# Altium PCB PCB_GTV3.3.PcbDoc (part 1 of 11)
Units mil, origin at the board's own origin, x right, y up, seen from the top; angles counter-clockwise.
Board outline 8070.87 x 4881.89 mil, 4 copper layers (Top Layer, GND, PWR, Bottom Layer), stack 61.653 mil thick; 464 components, 293 nets, 1458 pads, 748 vias.
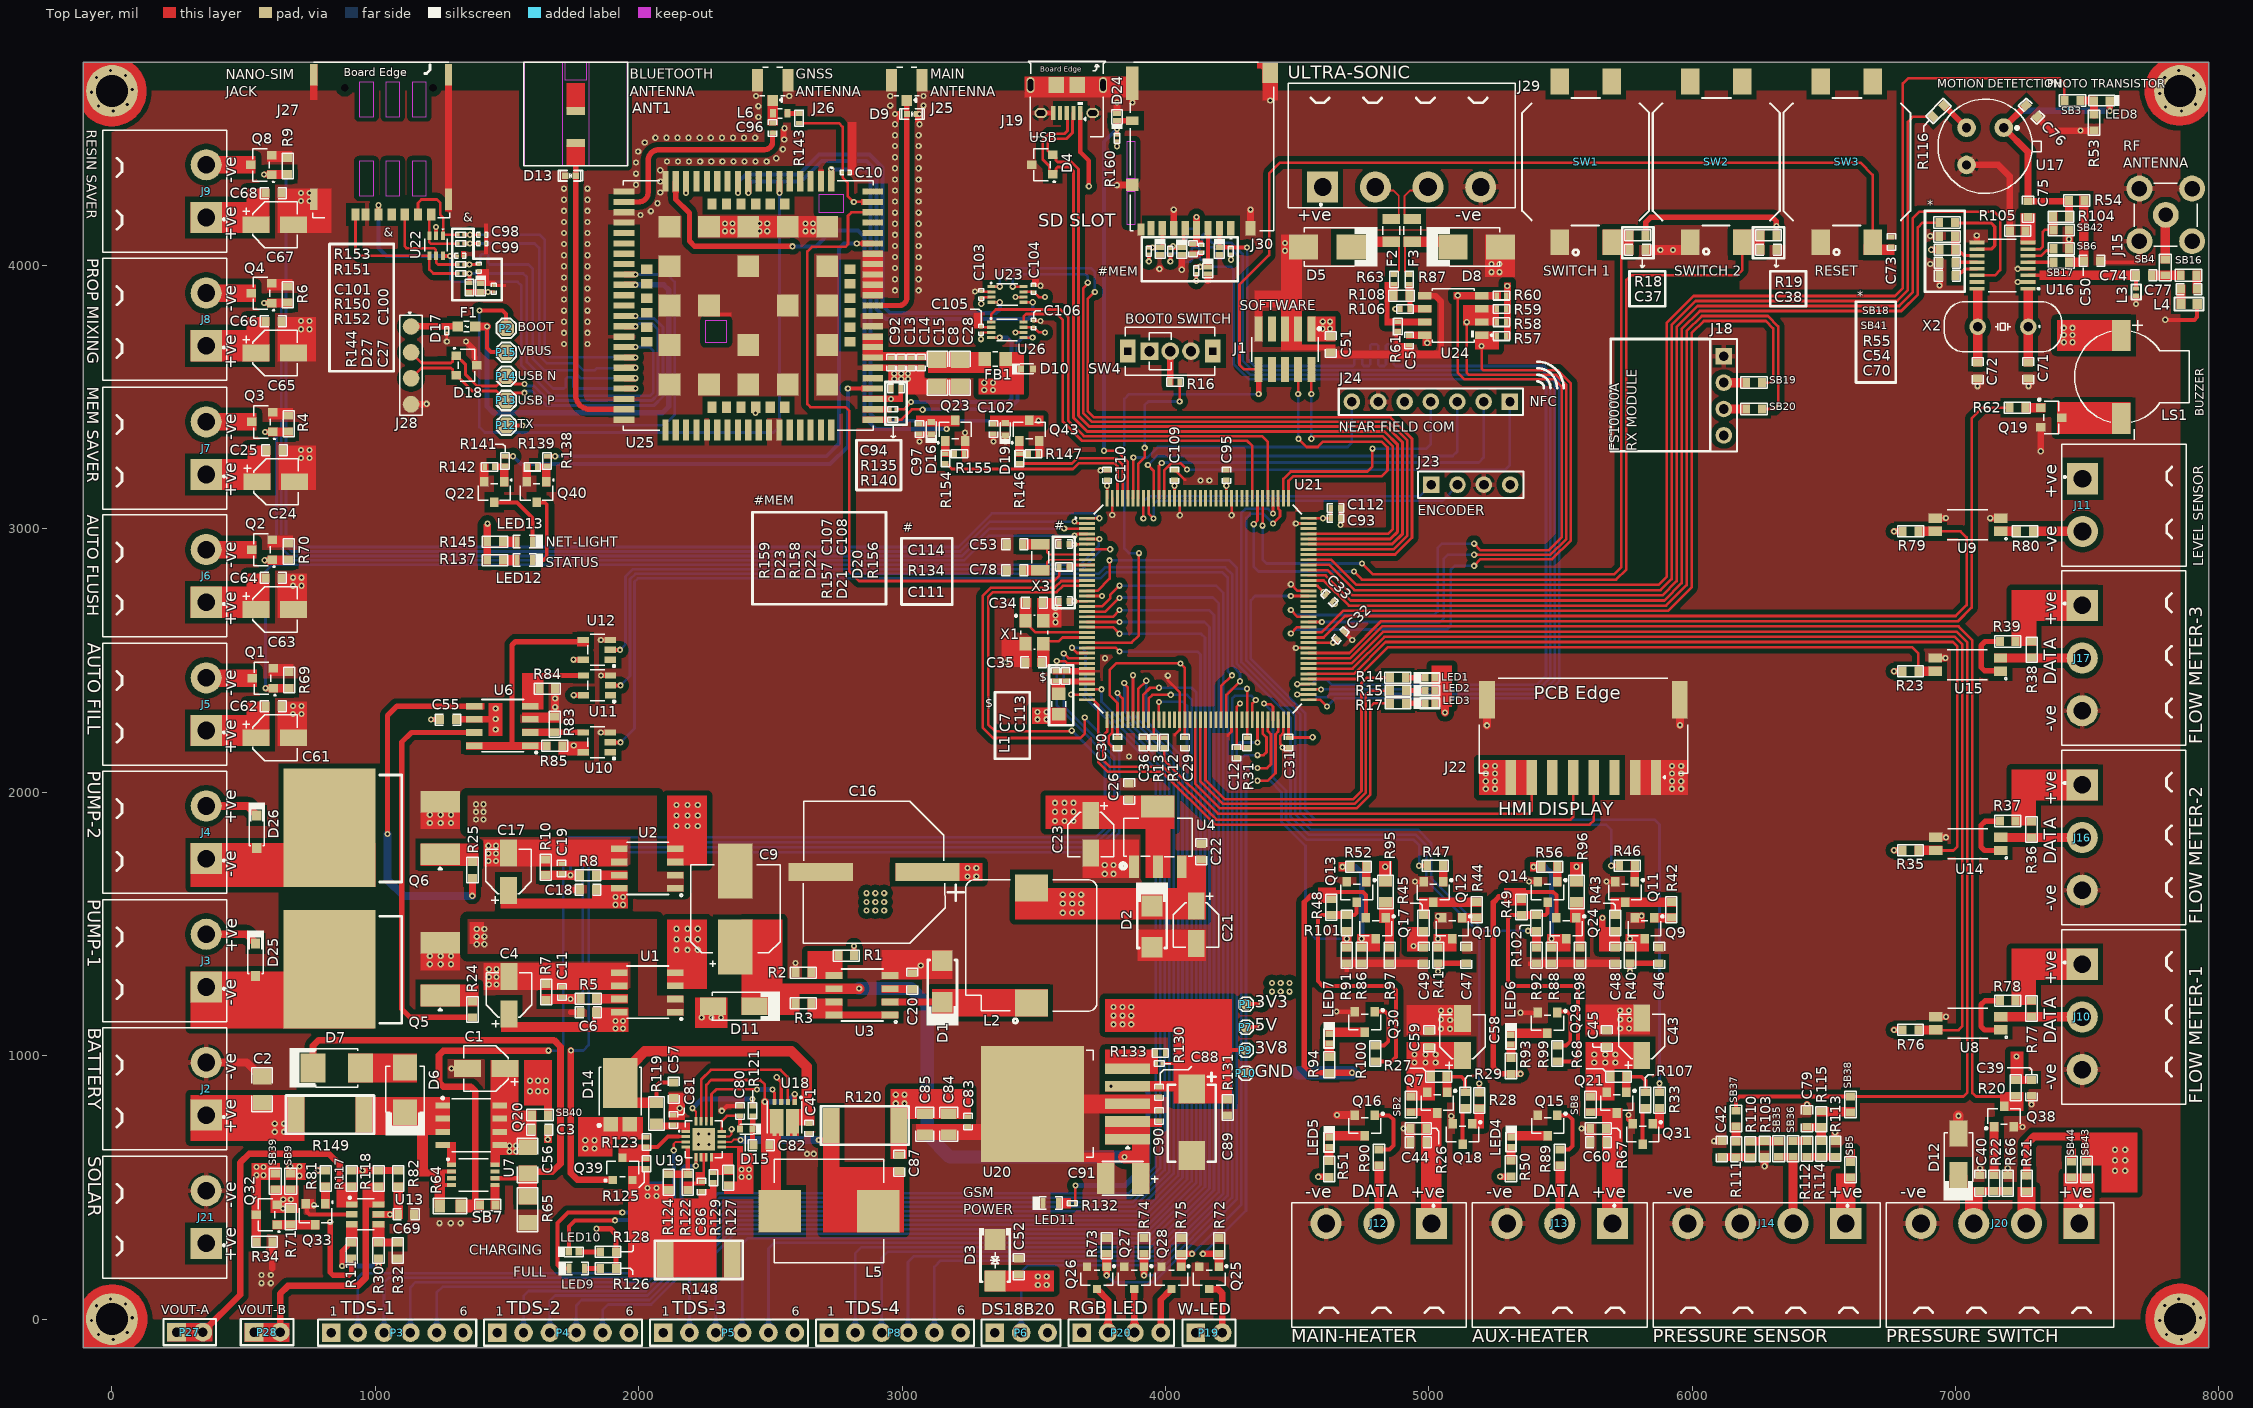
[diagram p0: Top Layer view]
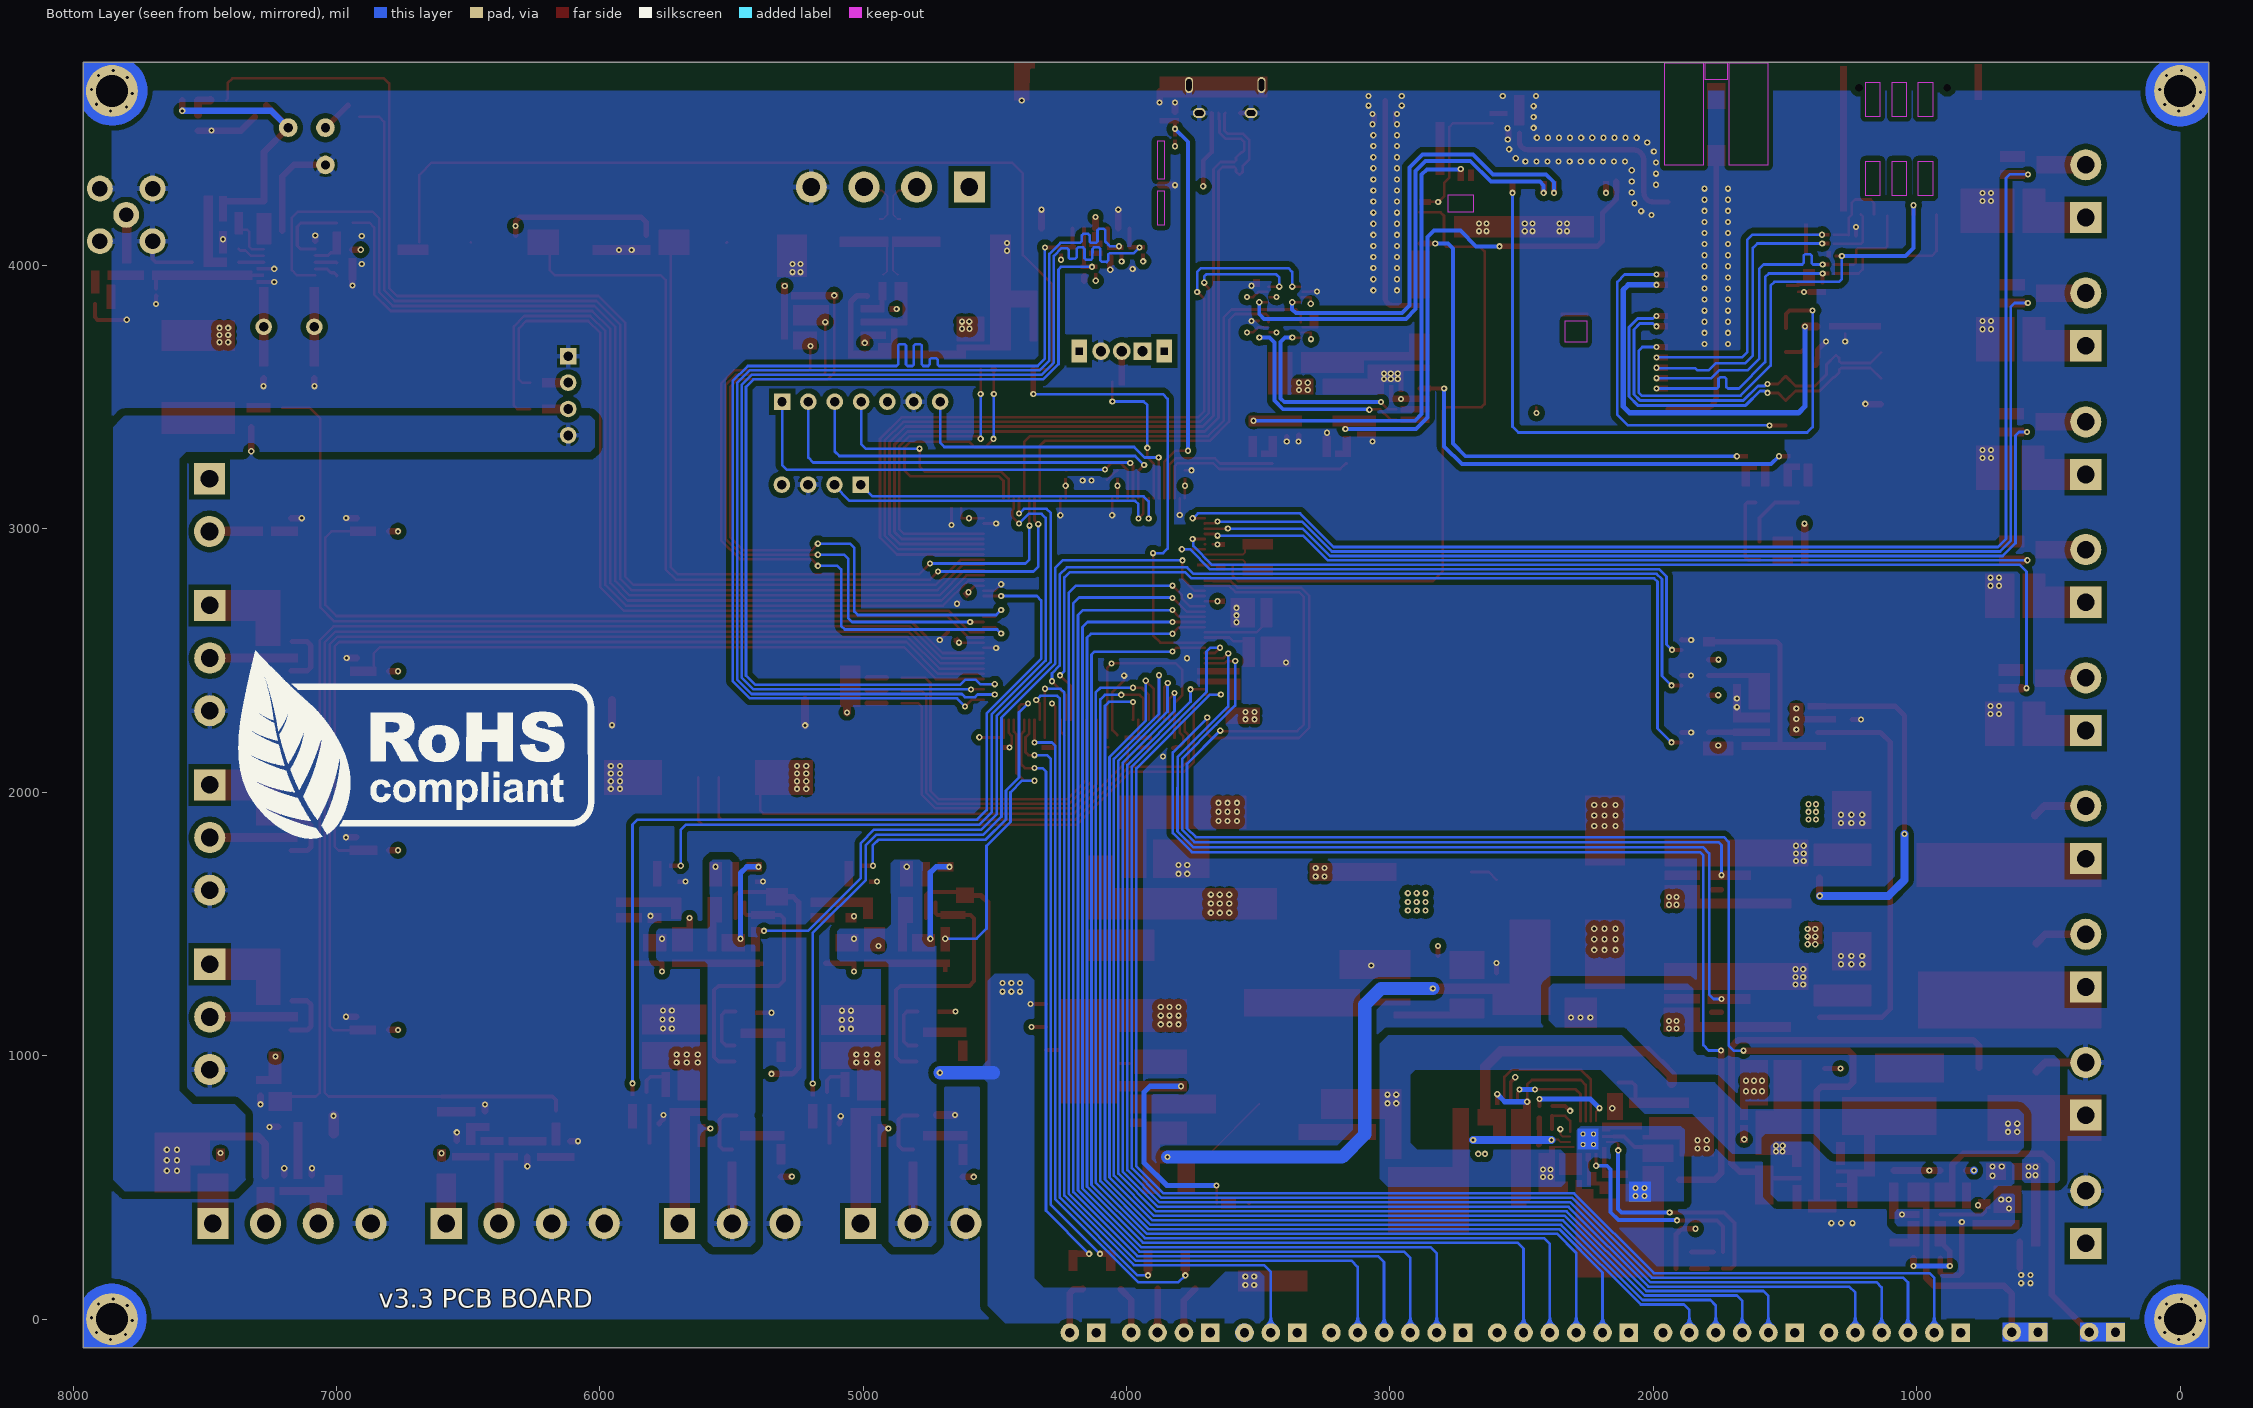
[diagram p1: Bottom Layer view, seen from below]
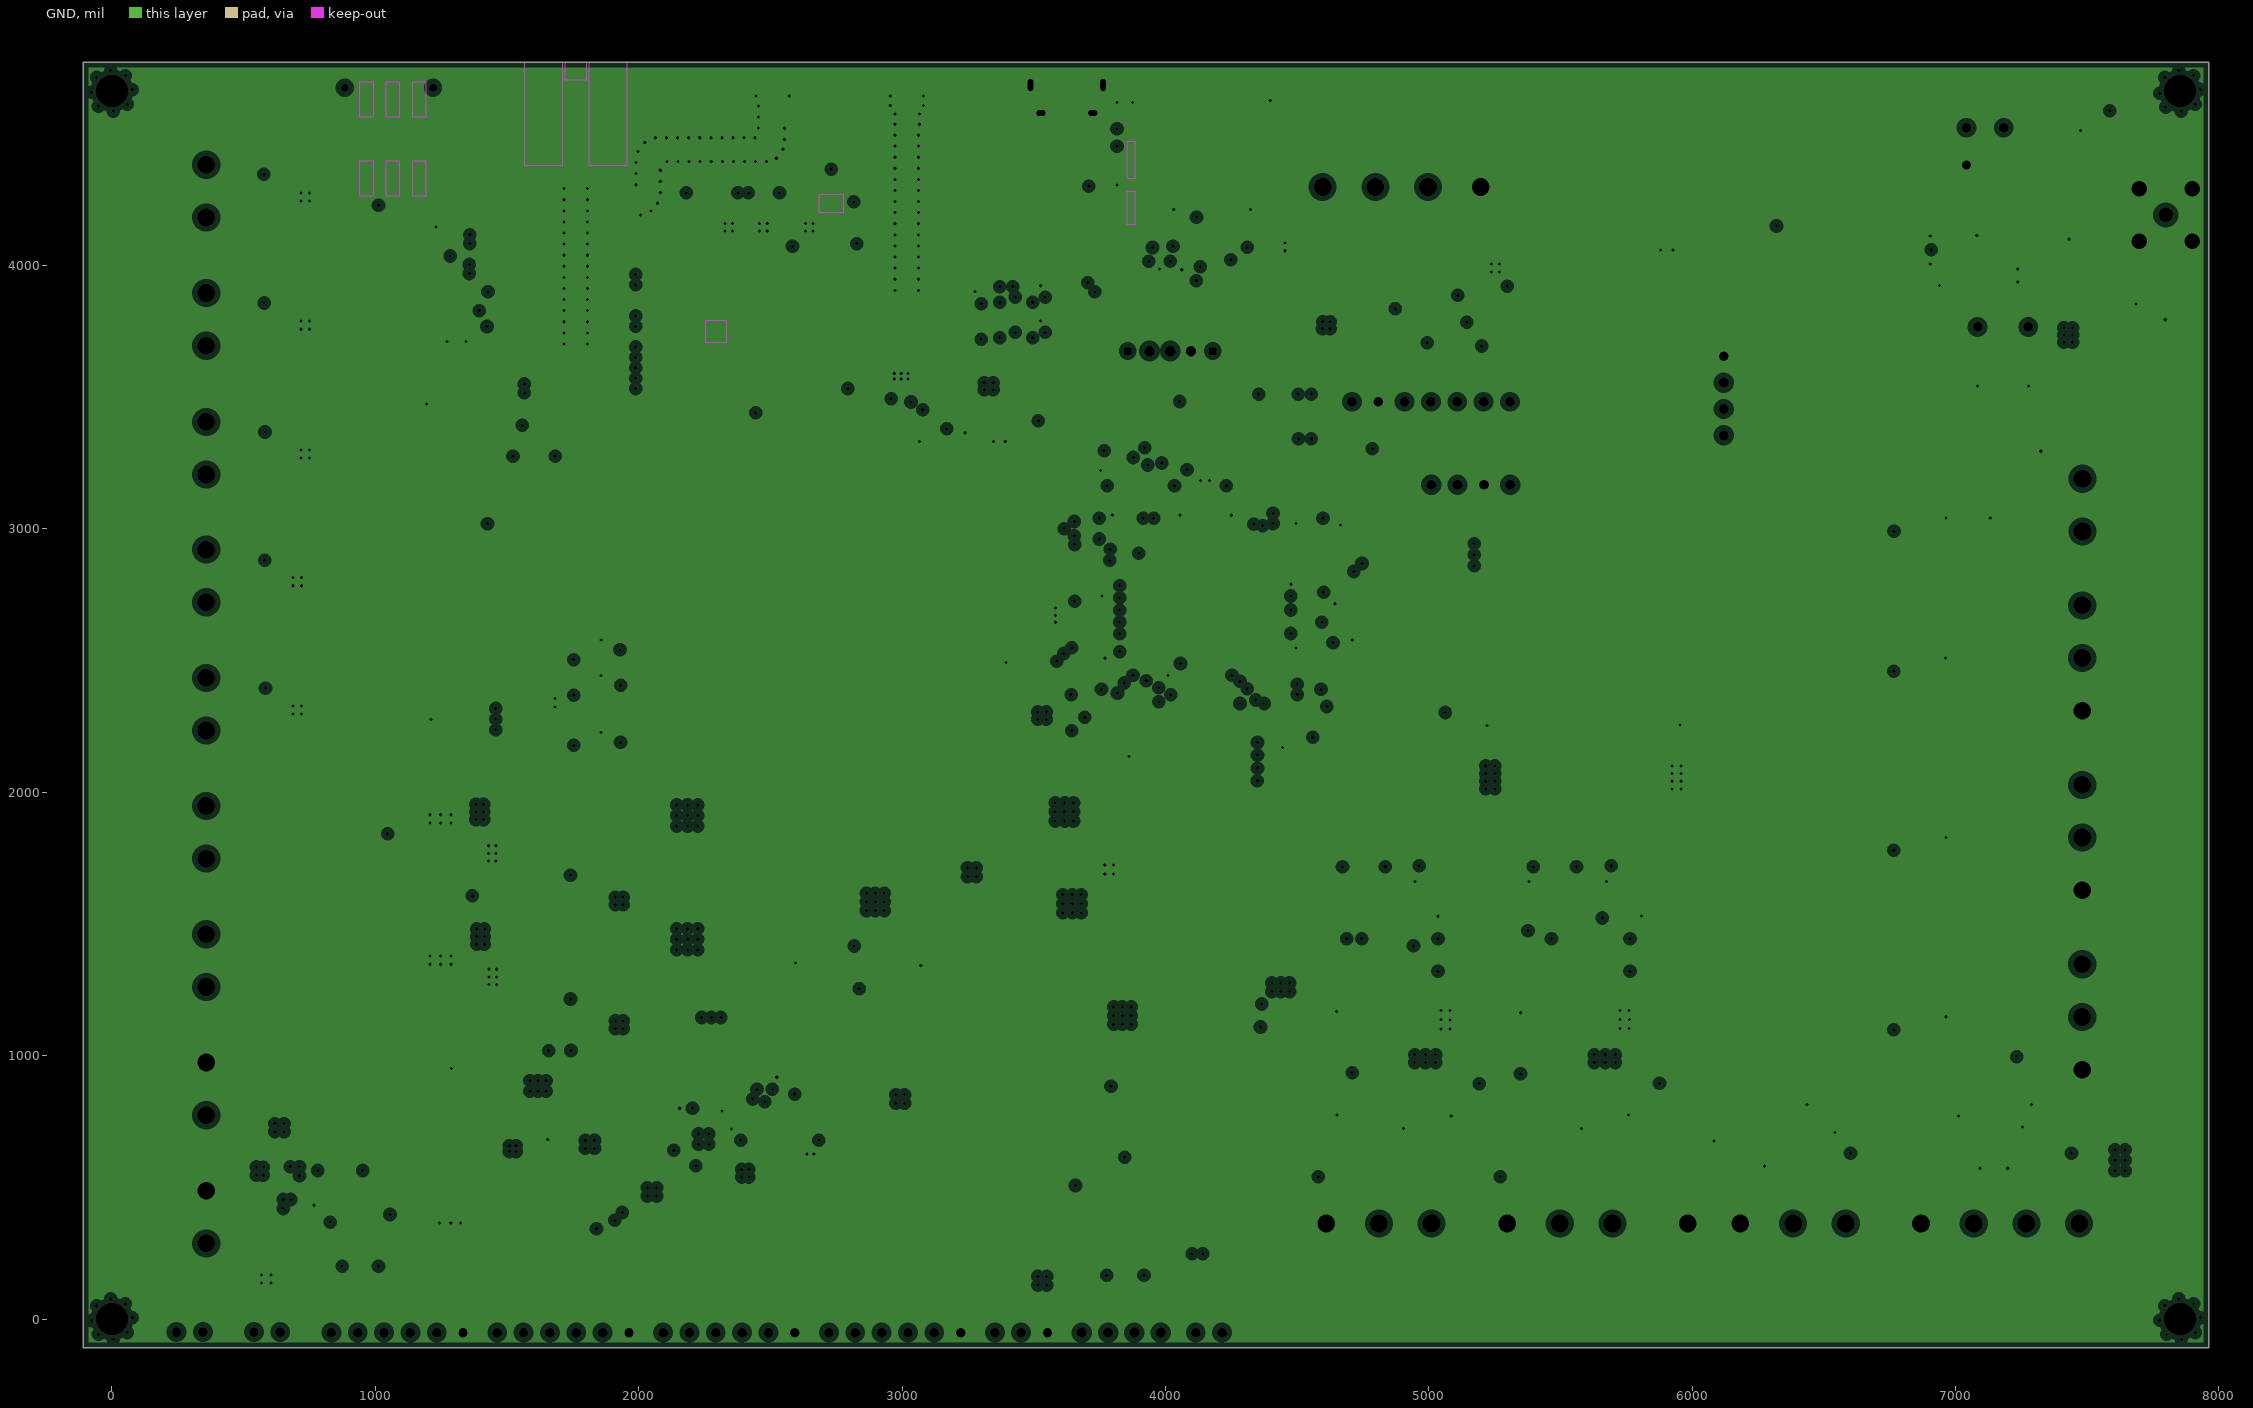
[diagram p2: GND, clearances drawn from the general rule]
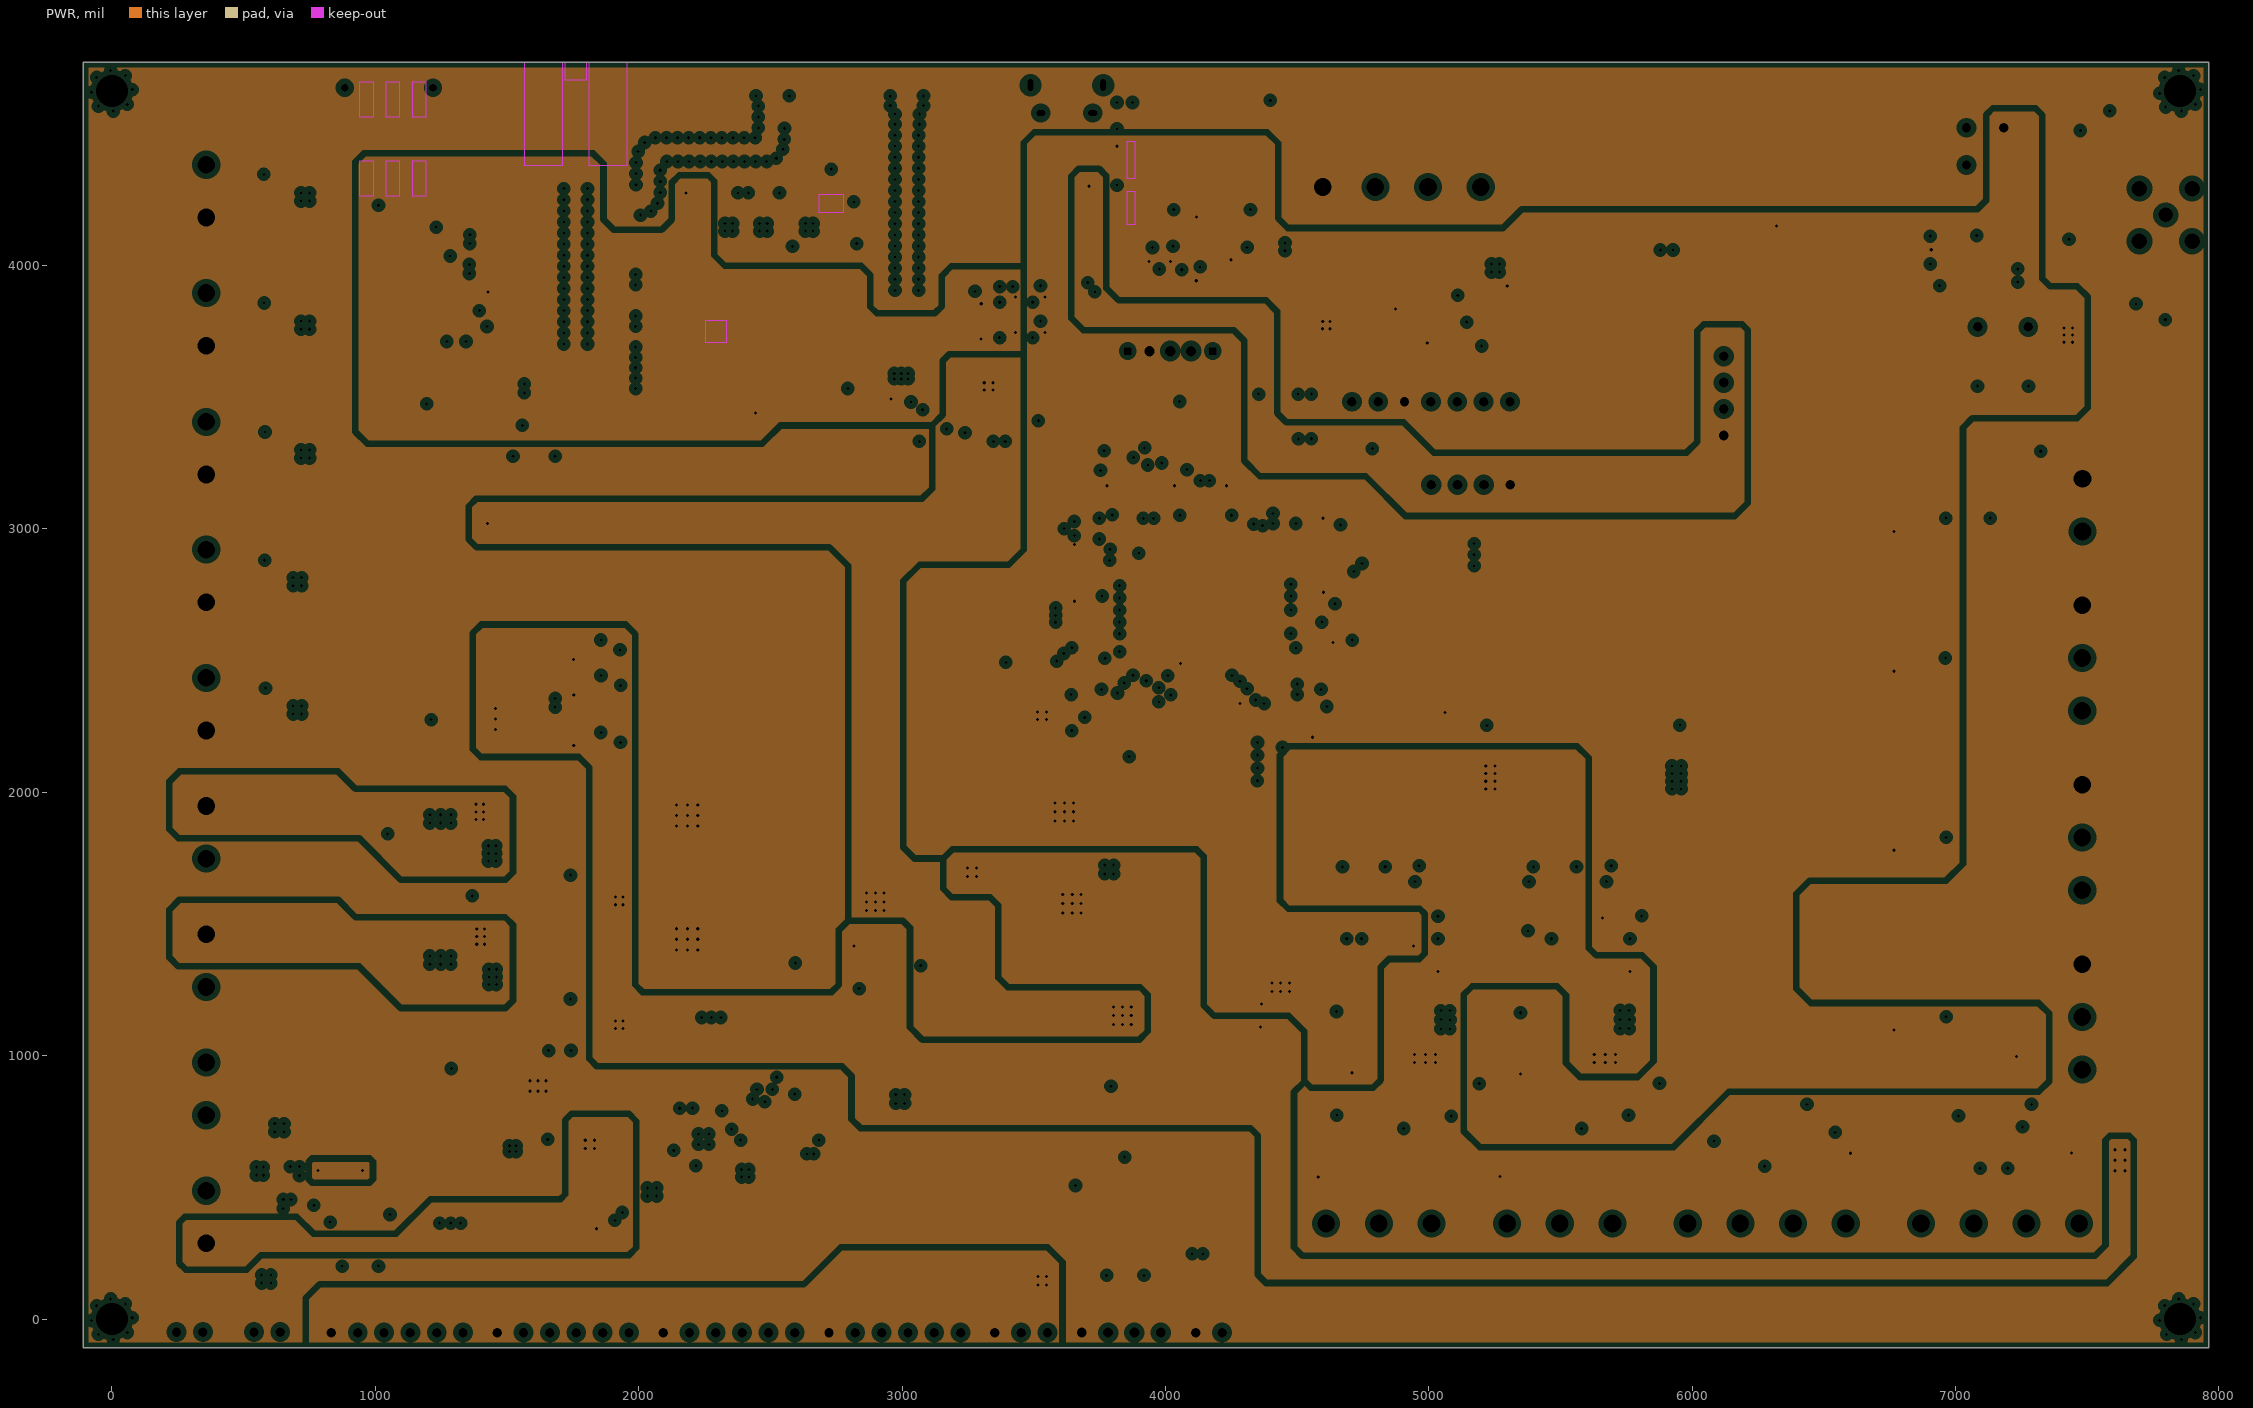
[diagram p3: PWR, clearances drawn from the general rule]
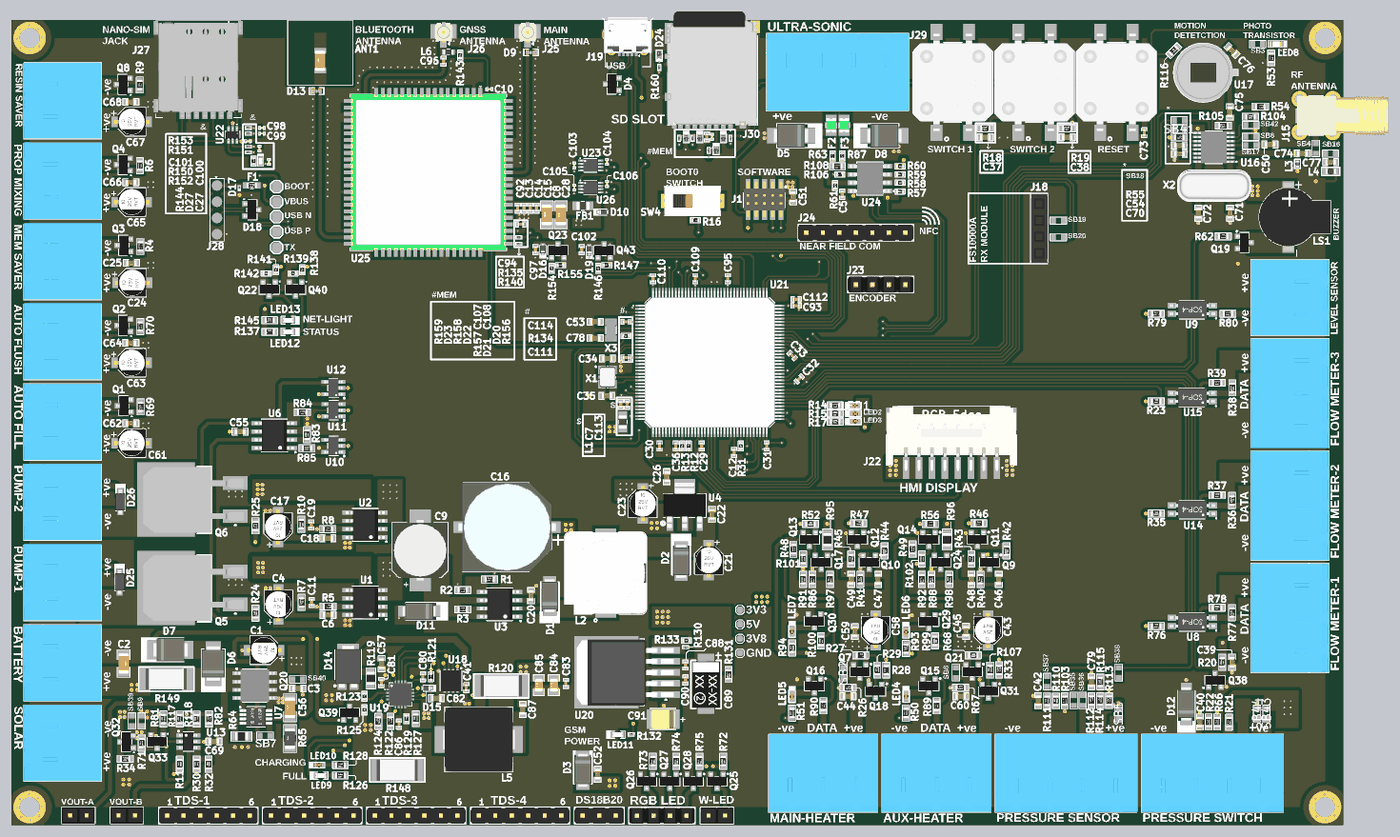
[diagram p9: 3D render of the assembled board from above, using the file's embedded part models]

## Layer stack, top to bottom
Top Solder: solder mask 0.709, Solder Resist, Dk 3.5
Top Layer: signal copper 1.378
Dielectric 2: prepreg 7.992, PP-006, Dk 4.4
GND: plane copper 1.181, net GND
Dielectric 1: core 40.551, FR-4, Dk 4.6
PWR: plane copper 1.181, net (Multiple Nets)
Dielectric 3: prepreg 7.992, PP-006, Dk 4.4
Bottom Layer: signal copper 1.378
Bottom Solder: solder mask 0.709, Solder Resist, Dk 3.5

## Board outline
-109.33,-109.43 7961.54,-109.43 7961.54,4772.46 -109.33,4772.46

## Design rules (kind name [scope] priority, off if disabled: settings)
Clearance [All] p1: gap=10 ignorepadtopadclearanceinfootprint=FALSE except(7: Arc-SMDPad Track-Track Track-SMDPad SMDPad-SMDPad SMDPad-Via SMDPad-Fill; 20: Arc-Poly Track-Poly SMDPad-Poly THPad-Poly Via-Poly Fill-Poly Poly-Region; 30: Poly-Poly)
ComponentClearance [All] p1: gap=0 collisioncheckmode=3 verticalgap=0 showdistances=FALSE
DiffPairsRouting RS485 [InDifferentialPairClass('RS485_LINES')] p1: maxlimit=15 minlimit=15 mostfreqgap=15 toplayer_minwidth=7 toplayer_maxwidth=7 toplayer_prefwidth=7 bottomlayer_minwidth=7 bottomlayer_maxwidth=7 bottomlayer_prefwidth=7 impedanceprofiledriven=TRUE impedanceprofileid={96F7C619-5FC5-426D-8E7C-580E3D6EA915} impedanceprofilevalue=120.000000 maxuncoupledlength=500
DiffPairsRouting USB [All] p2: maxlimit=8 minlimit=8 mostfreqgap=8 toplayer_minwidth=11 toplayer_maxwidth=11 toplayer_prefwidth=11 bottomlayer_minwidth=11 bottomlayer_maxwidth=11 bottomlayer_prefwidth=11 impedanceprofiledriven=TRUE impedanceprofileid={F2DA4722-311A-4C31-A35F-DFB7A417A014} impedanceprofilevalue=90.000000 maxuncoupledlength=500
HoleSize [All] p1: absolutevalues=TRUE maxlimit=1000 minlimit=1 maxpercent=80.000 minpercent=20.000
HoleToHoleClearance [All] p1: gap=0 allowstackedmicrovias=TRUE
MatchedLengths "Schematic Matched Net Lengths_1" [InNetClass('GSM_USB')] p1: tolerance=20 checknetsindiffpair=TRUE checkdiffpairvsdiffpair=FALSE checkxsignals=FALSE checkothers=FALSE
MatchedLengths "Schematic Matched Net Lengths" [InNetClass('RS485')] p2: tolerance=20 checknetsindiffpair=TRUE checkdiffpairvsdiffpair=FALSE checkxsignals=FALSE checkothers=FALSE
MatchedLengths "Schematic Matched Net Lengths_2" [InNetClass('USB_D')] p3: tolerance=50 checknetsindiffpair=TRUE checkdiffpairvsdiffpair=FALSE checkxsignals=FALSE checkothers=FALSE
MaxMinImpedance "Schematic Impedance Constraint_1" [InNetClass('GSM_USB')] p1: minimum=88.00 maximum=90.00
MaxMinImpedance "Schematic Impedance Constraint" [InNetClass('RS485')] p2: minimum=115.0 maximum=120.0
MaxMinImpedance "Schematic Impedance Constraint_2" [InNetClass('USB_D')] p3: minimum=85.00 maximum=90.00
MinimumSolderMaskSliver [All] p1: minsoldermaskwidth=0
PlaneClearance [All] p1: clearance=20
PlaneConnect [All] p1: pad.planeconnectstyle=Relief pad.reliefexpansion=20 pad.reliefentries=4 pad.reliefconductorwidth=20 pad.reliefairgap=10 via.planeconnectstyle=Direct via.reliefexpansion=20 via.reliefentries=4 via.reliefconductorwidth=10 via.reliefairgap=10
PolygonConnect [All] p1: thpad.connectstyle=Relief thpad.reliefconductorwidth=20 thpad.reliefentries=4 thpad.polygonreliefangle="90 Angle" thpad.airgapwidth=10 smdpad.connectstyle=Direct smdpad.reliefconductorwidth=20 smdpad.reliefentries=4 smdpad.polygonreliefangle="90 Angle" smdpad.airgapwidth=10 via.connectstyle=Direct via.reliefconductorwidth=10 via.reliefentries=4 via.polygonreliefangle="90 Angle" via.airgapwidth=10
RoutingVias [All] p1: holewidth=11.81 width=23.62 viastyle="Through Hole" minholewidth=11.81 minwidth=23.62 maxholewidth=31.5 maxwidth=62.99
SilkToSilkClearance [All] p1: silktosilkclearance=0
SilkToSolderMaskClearance [IsPad] p1: minsilkscreentomaskgap=0 clearancetoexposedcopper=TRUE
SolderMaskExpansion SolderMaskExpansion_1 [IsVia] p1: expansion=0 istentingtop=FALSE soldermaskfromhole=TRUE
SolderMaskExpansion [Not IsVia] p2: expansion=4 istentingtop=FALSE
Width [All] p1: maxlimit=70 minlimit=7 preferedwidth=10 minimp=50.000000 maximp=50.000000 favimp=50.000000
21 further rules are at their usual default settings.

## Classes and differential pairs
component class U_SD-Card-Sheet: C107 C108 D20 D21 D22 D23 D24 J30 R156 R157 R158 R159 R160
differential pair class RS485_LINES: RS485
net class RS485: RS485_N RS485_P
component class U_Ultra_Sonic_Section: C5 D5 D8 F2 F3 J29 R57 R58 R59 R60 R61 R63 R87 R106 R108 U24
component class U_HMI_Encoder_NFC_Sheet: J22 J23 J24
differential pair class GSM_USB_Lines: GSM_USB_D
net class GSM_USB: GSM_USB_D_N GSM_USB_D_P
component class U_Solar_Charge_Controller: C41 C57 C80 C81 C82 C83 C84 C85 C86 C87 D14 D15 J21 L5 LED9 LED10 Q39 R119 R120 R121 R122 R123 R124 R125 R126 R127 R128 R129 R148 U18 U19
component class U_GSM_Sheet: ANT1 C8 C10 C13 C14 C15 C27 C28 C92 C94 C96 C97 C98 C99 C100 C101 C102 C103 C104 C105 C106 D9 D10 D13 D16 D17 D18 D19 D27 F1 FB1 J25 J26 J27 J28 L6 LED12 LED13 P2 P12 P13 P14 P15 Q22 Q23 Q40 Q43 R134 R135 R137 R138 R139 R140 R141 R142 R143 R144 R145 R146 R147 R150 R151 R152 R153 R154 R155 U22 U23 U25 U26
differential pair class USB_D_Lines: USB_D
net class USB_D: USB_D_N USB_D_P
component class U_Voltage_Monitoring_Section: C69 P27 P28 Q32 Q33 R11 R30 R32 R34 R71 R81 R82 R117 R118 S SB9 SB39 U13
component class U_Temperature_Sense_Section: C52 D3 P3 P4 P5 P6 P8
component class U_Valve_Section: C24 C25 C61 C62 C63 C64 C65 C66 C67 C68 J5 J6 J7 J8 J9 Q1 Q2 Q3 Q4 Q8 R4 R6 R9 R69 R70 S
component class U_Sensor_Section: J10 J11 J16 J17 R23 R35 R36 R37 R38 R39 R76 R77 R78 R79 R80 U8 U9 U14 U15
component class U_LED_Section: P19 P20 Q25 Q26 Q27 Q28 R72 R73 R74 R75 S
component class U_Heater_Section: C43 C44 C45 C46 C47 C48 C49 C58 C59 C60 J12 J13 LED4 LED5 LED6 LED7 Q7 Q9 Q10 Q11 Q12 Q13 Q14 Q15 Q16 Q17 Q18 Q21 Q24 Q29 Q30 Q31 R26 R27 R28 R29 R33 R40 R41 R42 R43 R44 R45 R46 R47 R48 R49 R50 R51 R52 R56 R67 R68 R86 R88 R89 R90 R91 R92 R93 R94 R95 R96 R97 R98 R99 R100 R101 R102 R107 S SB2 SB8
component class U_Switch_Sheet: C37 C38 R18 R19 SW1 SW2
component class U_Regulator_Section: C9 C16 C20 C21 C22 C23 C26 C88 C89 C90 C91 D1 D2 D11 L2 LED11 P1 P7 P9 P10 R1 R2 R3 R130 R131 R132 R133 U3 U4 U20
component class U_Receiver_Section: C50 C54 C70 C71 C72 C74 C75 C77 J15 J18 L3 L4 R54 R55 R104 R105 S SB4 SB6 SB16 SB17 SB18 SB19 SB20 SB41 SB42 U16 X2
component class U_Gate_Driver_Section: C55 D25 D26 J3 J4 Q5 Q6 R24 R25 R83 R84 R85 U6 U10 U11 U12
component class U_Current_Sense_Section: C4 C6 C11 C17 C18 C19 R5 R7 R8 R10 U1 U2
component class U_Controller_Section: C7 C12 C29 C30 C31 C32 C33 C34 C35 C36 C53 C73 C78 C93 C95 C109 C110 C111 C112 C113 C114 L1 LED1 LED2 LED3 R12 R13 R14 R15 R16 R17 R31 S SW3 SW4 U21 X1 X3
component class U_Connector_Section: C39 C40 C42 C51 C76 C79 D4 D12 J1 J14 J19 J20 LED8 LS1 Q19 Q38 R20 R21 R22 R53 R62 R66 R103 R110 R111 R112 R113 R114 R115 R116 S SB3 SB5 SB35 SB36 SB37 SB38 SB43 SB44 U17
component class "U_Reverse Protection_Section": C1 C2 C3 C56 D6 D7 J2 Q20 R64 R65 R149 SB7 SB40 U7
differential pair RS485: +RS485_P -RS485_N
differential pair GSM_USB_D: +GSM_USB_D_P -GSM_USB_D_N
differential pair USB_D: +USB_D_P -USB_D_N

## Components (designator, comment, footprint, x,y, rotation, side; value= is the part's Value field where it differs from the comment)
ANT1 "ANT3216LL00R2400A" ANT3216LL00R2400A 1760.87,4464.99 r90 top locked
C1 "10uF" RVT1E100M0405. 1421.11,951.4 r180 top
C2 "0.1uF" Cap-1206 569.87,871.03 r270 top
C3 "1uF" Cap0603 1624.87,719.03 r0 top
C4 "10uF" RVT1E100M0405. 1507.5,1229.51 r90 top
C5 "0.1uf" Cap-0402 4925.03,3715.56 r90 top
C6 "0.1uF" Cap0603 1808.5,1165.29 r180 top
C7 "1uF" Cap-0402 3583,2442 r90 top
C8 "100uF" Cap-1206 3134.32,3591.03 r90 top
C9 "100uF" UWX1E101MCL1GB 2366.88,1557.19 r90 top
C10 "0.1uF" CAP-0201 2786.08,4353.28 r0 top
C11 "1nF" Cap-0402 1709.28,1241.51 r90 top
C12 "0.1uF" Cap-0402 4270.14,2150.51 r270 top
C13 "10pF" Cap-0402 2996.3,3631.51 r90 top
C14 "33pF" Cap-0402 3034.32,3631.51 r90 top
C15 "1uF" Cap-0402 3072.32,3631.51 r90 top
C16 "470uF" VT1H471MI135000CE0 2893.98,1697.4 r180 top
C17 "10uF" RVT1E100M0405. 1505.55,1698.51 r90 top
C18 "0.1uF" Cap0603 1807.5,1630.29 r180 top
C19 "1nF" Cap-0402 1707.28,1710.51 r90 top
C20 "470pF" Cap0603 3038.87,1283.03 r270 top
C21 "10uF" RVT1E100M0405. 4116.22,1497.2 r270 top
C22 "0.1uF" Cap0603 4135.98,1774.4 r90 top
C23 "10uF" RVT1E100M0405. 3716.12,1840.43 r270 top
C24 "10uF" RVT1E100M0405. 622,3179.07 r0 top
C25 "0.1uF" Cap0603 617,3299.03 r0 top
C26 "0.1uF" Cap0603 3862,2003 r90 top
C27 "0.1uF" CAP-0201 1450,3912 r90 top
C28 "100uF" Cap-1206 3220.32,3591.03 r90 top
C29 "0.1uF" Cap-0402 4073.66,2189 r270 top
C30 "0.1uF" Cap-0402 3817.75,2189 r270 top
C31 "0.1uF" Cap-0402 4467.36,2189 r270 top
C32 "0.1uF" Cap-0402 4664.55,2596.28 r45 top
C33 "0.1uF" Cap-0402 4621.95,2737.9 r315 top
C34 "30pF" Cap0603 3502.16,2719.66 r180 top
C35 "30pF" Cap0603 3499.16,2493.31 r0 top
C36 "0.1uF" Cap-0402 3916.17,2189 r270 top
C37 "0.1uF" Cap0603 5792.92,4060.4 r180 top
C38 "0.1uF" Cap0603 6289.27,4060.4 r180 top
C39 "0.1uF" Cap0603 7288.23,878.03 r270 top
C40 "1uF" Cap0603 7092.99,516.03 r90 top
C41 "1uF" Cap0402 2646.47,724.25 r90 top
C42 "1uF" Cap-0603 6112.87,645.4 r90 top
C43 "10uF" RVT1E100M0405. 5808.37,1072.03 r90 top
C44 "0.1uF" Cap0603 4960.17,671.62 r0 top
C45 "1uF" Cap0603 5675.87,1065.03 r90 top
C46 "0.1uF" Cap0603 5874.27,1381.03 r90 top
C47 "0.1uF" Cap0603 5142.11,1381.03 r90 top
C48 "0.1uF" Cap0603 5707.87,1381.03 r270 top
C49 "0.1uF" Cap0603 4979.87,1381.03 r270 top
C50 "0.1uF" Cap-0603 7517.87,4017.59 r0 top
C51 "0.1uF" Cap0603 4627.92,3699.92 r270 top
C52 "0.1uF" Cap0603 3442.87,199.03 r90 top
C53 "20pF" Cap0603 3428,2942.1 r0 top
C54 "0.1uF" Cap-0603 6968.87,4010.7 r180 top
C55 "0.1uF" Cap0603 1275.87,2276.03 r180 top
C56 "0.047uF" Cap-1206 1577.98,602.4 r90 top
C57 "10uF" Cap0603 2132.75,868.67 r90 top
C58 "10uF" RVT1E100M0405. 5127.87,1071.03 r90 top
C59 "1uF" Cap0603 5001.64,1064.03 r90 top
C60 "0.1uF" Cap0603 5643.87,671.62 r0 top
C61 "10uF" RVT1E100M0405. 618,2207.07 r0 top
C62 "0.1uF" Cap0603 613,2327 r0 top
C63 "10uF" RVT1E100M0405. 618,2694.03 r0 top
C64 "0.1uF" Cap0603 613,2814.03 r0 top
C65 "10uF" RVT1E100M0405. 618,3668 r0 top
C66 "0.1uF" Cap0603 613,3788 r0 top
C67 "10uF" RVT1E100M0405. 618,4155.18 r0 top
C68 "0.1uF" Cap0603 613,4275 r0 top
C69 "0.1uF" Cap0603 1117.14,397.46 r0 top
C70 "0.47uF" Cap0603 6968.87,3961.03 r180 top
C71 "20pF" Cap-0603 7275.93,3601.03 r90 top
C72 "20pF" Cap-0603 7083.93,3601.03 r90 top
C73 "0.1uF" Cap-0402 6755.87,4089.03 r270 top
C74 "1.2pF" Cap0603 7714.87,3963.03 r0 top
C75 "2.2uF" Cap0603 7274.87,4214.03 r90 top
C76 "0.1uF" Cap0603 7288.18,4586.37 r315 top
C77 "1.5pF" Cap0603 7885.87,3910.69 r0 top
C78 "20pF" Cap0603 3428,2843.1 r0 top
C79 "1uF" Cap-0603 6435.87,760.03 r270 top
C80 "1uF" Cap0402 2383.87,790.03 r90 top
C81 "1uF" Cap0402 2131.75,755.67 r270 top
C82 "0.1uF" Cap0603 2465.75,660.67 r0 top
C83 "1uF" Cap0402 3249.75,749.67 r90 top
C84 "22uF" Cap-0805 3177.25,739.67 r90 top
C85 "22uF" Cap-0805 3086.75,739.67 r90 top
C86 "1uF" Cap0402 2238.63,503.17 r90 top
C87 "0.1uF" Cap0603 2988.87,592.03 r90 top
C88 "0.1uf" Cap-0402 3974.73,861.41 r90 top
C89 "330uF" Case-E 4099.73,874.16 r270 top
C90 "0.1uf" Cap-0402 3974.73,771.16 r270 top
C91 "100uF" Case-B 3839.73,534.16 r180 top
C92 "0.1uF" Cap-0402 2958.32,3631.51 r90 top
C93 "0.1uF" Cap-0402 4646,3040.52 r0 top
C94 "2.2uF" Cap-0402 2976.87,3533.07 r180 top
C95 "0.1uF" Cap-0402 4231.14,3204 r90 top
C96 "33pF" Cap-0402 2508.52,4522.79 r90 top
C97 "0.1uf" Cap-0402 3065.6,3379.76 r90 top
C98 "22PF" CAP-0201 1406.77,4117.12 r180 top value=22pF
C99 "22pF" CAP-0201 1406.77,4083.5 r180 top
C100 "22pF" CAP-0201 1392.87,3992.22 r90 top
C101 "0.1uf" CAP-0201 1322.86,4036.85 r0 top
C102 "0.1uf" Cap-0402 3346.6,3379.76 r90 top
C103 "0.1uf" CAP-0201 3300.41,3890.18 r90 top
C104 "0.1uf" CAP-0201 3499,3912 r90 top
C105 "" CAP-0201 3300,3756 r90 top
C106 "" CAP-0201 3499,3778 r90 top
C107 "10uF" Cap-0402 4104.37,4063.5 r90 top
C108 "0.1uF" CAP-0201 4136,4063.77 r90 top
C109 "0.1uF" Cap-0402 4034.28,3204 r90 top
C110 "0.1uF" Cap-0402 3778.38,3204 r90 top
C111 "0.1uF" Cap-0402 3615.36,2725.56 r180 top
C112 "10uF" Cap-0402 4646,3079 r0 top
C113 "0.1uF" Cap-0402 3621,2442 r90 top
C114 "0.1uF" Cap-0402 3615.36,2942.1 r180 top
D1 "SS24A" SMA#1 3152.87,1282.03 r90 top
D2 "1SMA5930BT3G" SMA#1 3948.87,1490.03 r270 top
D3 "SMAJ5.0CA" SMAJ5.0CA 3352.98,223.4 r270 top
D4 "ESD5302F-3/TR" Sot-23 3531.88,4383.23 r90 top
D5 "SMBJ26CA" SMB_ 4614.87,4070.55 r0 top
D6 "SMBJ70A/TR13" SMB 1112.87,870.03 r90 top
D7 "SS510B" SS510B 853.87,954.03 r0 top
D8 "SMBJ26CA" SMB_ 5181.92,4070.55 r180 top
D9 "TPESD0402G03V" TPESD0402G03V 3038,4575 r180 top
D10 "LESD5D5.0CT1G" SOD-523 3473.92,3607.42 r180 top
D11 "SS32 /SMA(DO-214AC)" SMA#2 2360.98,1187.4 r180 top
D12 "SMAJ5.0CA" SMA#2 7010.87,626.03 r90 top
D13 "TPESD0402G03V" TPESD0402G03V 1741,4341 r0 top
D14 "PDS1040-13" "PowerDI™ 5" 1929.97,818.06 r0 top
D15 "ZLLS350TA" SOD-523 2408.75,721.36 r0 top value=3.5pF
D16 "LESD5D5.0CT1G" SOD-523 3110.6,3382.26 r270 top
D17 "PESD5V0H1BSFYL" DSN0603-2 1271.6,3752.89 r90 top
D18 "ESD5302F-3/TR" Sot-23 1346,3621 r270 top
D19 "LESD5D5.0CT1G" SOD-523 3391.54,3378.26 r270 top
D20 "LESD8D3.3CAT5G" SOD-882 4205,4055 r90 top
D21 "LESD8D3.3CAT5G" SOD-882 4160.84,3981.3 r90 top
D22 "LESD8D3.3CAT5G" SOD-882 4061.84,4054.78 r90 top
D23 "LESD8D3.3CAT5G" SOD-882 3980,4055 r90 top
D24 "LESD8D3.3CAT5G" SOD-882 3816,4564 r270 top
D25 "1N4148W-7-F" SOD-123 544.98,1364.4 r90 top value=2pF
D26 "1N4148W-7-F" SOD-123 549.98,1850.4 r90 top value=2pF
D27 "ESD5651N-2/TR" DFN1006-2L_ 1399.75,3916.53 r270 top
F1 "SMD0603-050" Fuse-0603 1346.6,3768.61 r180 top
F2 "SMD0805P020TF" Fuse-0805 4857.92,4133.54 r90 top
F3 "SMD0805P020TF" Fuse-0805 4937.54,4133.54 r90 top
FB1 "100MHz" Ind-0805 3353.87,3645.03 r0 top
J1 "20021121-00010C4LF" 20021121-00010C4LF_ 4453.87,3682.81 r180 top
J2 "TBP01R1-508-02BE" TBP01R1-508-02BE 357.92,874.12 r90 top
J3 "TBP01R1-508-02BE" TBP01R1-508-02BE 357.92,1361.02 r90 top
J4 "TBP01R1-508-02BE" TBP01R1-508-02BE 357.92,1848.07 r90 top
J5 "TBP01R1-508-02BE" TBP01R1-508-02BE 357.92,2334.57 r90 top
J6 "TBP01R1-508-02BE" TBP01R1-508-02BE 357.92,2821.57 r90 top
J7 "TBP01R1-508-02BE" TBP01R1-508-02BE 357.92,3306.57 r90 top
J8 "TBP01R1-508-02BE" TBP01R1-508-02BE 357.92,3795.57 r90 top
J9 "TBP01R1-508-02BE" TBP01R1-508-02BE 357.92,4282.57 r90 top
J10 "TBP01R1-508-03BE" TBP01R1-508-03BE 7480.98,1247.06 r270 top
J11 "TBP01R1-508-02BE" TBP01R1-508-02BE 7481.98,3090.4 r270 top
J12 "TBP01R1-508-03BE" TBP01R1-508-03BE 4910.15,363.03 r180 top
J13 "TBP01R1-508-03BE" TBP01R1-508-03BE 5597.15,363.03 r180 top
J14 "TBP01R1-508-04BE" TBP01R1-508-04BE 6382.98,363.03 r180 top
J15 "HJ-SMA508" HJ-SMA508 7797.98,4192.4 r270 top
J16 "TBP01R1-508-03BE" TBP01R1-508-03BE 7480.98,1928.4 r270 top
J17 "TBP01R1-508-03BE" TBP01R1-508-03BE 7480.98,2609.73 r270 top
J18 "C2718488" "HDR1X4 Female" 6119.98,3505.4 r270 top
J19 "10118194-0001LF" 10118194-0001LF_ 3625.39,4579.07 r180 top
J20 "TBP01R1-508-04BE" TBP01R1-508-04BE 7268.81,363.03 r180 top
J21 "TBP01R1-508-02BE" TBP01R1-508-02BE 357.92,387.22 r90 top
J22 "A2008WR-S-8P" A2008WR-S-8P 5567.33,2203.67 r180 top locked
J23 "B-2100S04P-A110" HDR1X4_ 5008.87,3168.03 r0 top
J24 "PZ254V-11-07P" HDR1X7 5307.87,3483.03 r180 top
J25 "U.FL-R-SMT-1(80)" U.FL-R-SMT-1(80)_ 3017.98,4665.4 r0 top
J26 "U.FL-R-SMT-1(80)" U.FL-R-SMT-1(80)_ 2508.52,4665.4 r0 top
J27 "XKNANO-113" XKNANO-113 1021.77,4459.25 r180 top locked
J28 "POGO Connector 4 Pin" "Pogo 4 Pin" 1135.6,3620.98 r270 top
J29 "TBP01R1-508-04BE" TBP01R1-508-04BE 4796.87,4298.03 r0 top
J30 "DM3BT-DSF-PEJS" DM3BT-DSF-PEJS 4135.87,4434.03 r180 top locked
L1 "10uH" Ind-0805 3595,2335 r90 top
L2 "220uH" SLF12575T-221M1R3-PF 3490.98,1418.4 r90 top
L3 "39nH" "IND 0402" 7685.3,3899.29 r270 top
L4 "33nH" "IND 0603" 7886.45,3854.03 r0 top
L5 "3.3uH" YSPI1040-3R3M 2722.87,410.03 r0 top
L6 "68nH" "IND-0603 (1608 Metric)" 2537.52,4578.04 r180 top
LED1 "XZMDK68W-2" "LED 0402" 5004.36,2434.16 r180 top
LED2 "XZMDK68W-2" "LED 0402" 5004.36,2386.1 r180 top
LED3 "XZMDK68W-2" "LED 0402" 5004.36,2338.03 r180 top
LED4 "XZMDK68W-2" "LED 0402" 5312.43,671.92 r90 top
LED5 "XZMDK68W-2" "LED 0402" 4621.23,670.92 r90 top
LED6 "XZMDK68W-2" "LED 0402" 5311.87,1061.07 r90 top
LED7 "XZMDK68W-2" "LED 0402" 4621.23,1065.07 r90 top
LED8 "ALS-PT19-315C/L177/TR8" ALS-PT19-315C/L177/TR 7554.98,4626.4 r180 top
LED9 "RED" LED-0603 1764.87,192.03 r180 top
LED10 "Green" LED-0402 1753.87,255.03 r180 top
LED11 "RED" LED-0603 3564.87,440.03 r180 top
LED12 "Yellow" LED-0603 1567.87,2881.6 r0 top
LED13 "RED" LED-0603 1567.87,2952.03 r0 top
LS1 "YS-SBZ9032C03R16" YS-SBZ9032C03R16 7628.87,3577.51 r270 top locked
P1 "TEST POINT 0.5mm Dia" "Test-point - 0.5mm" 4306,1196 r0 top
P2 "TEST POINT" Test-point 1497,3761.64 r0 top
P3 "61300611121" HDR1X6 833.12,-51.43 r0 top
P4 "61300611121" HDR1X6 1462.87,-51.43 r0 top
P5 "61300611121" HDR1X6 2092.62,-51.43 r0 top
P6 "61300311121" HDR1X3 3352.12,-51.43 r0 top
P7 "TEST POINT 0.5mm Dia" "Test-point - 0.5mm" 4305.75,1108.68 r0 top
P8 "61300611121" HDR1X6 2722.37,-51.43 r0 top
P9 "TEST POINT 0.5mm Dia" "Test-point - 0.5mm" 4305.75,1021.36 r0 top
P10 "TEST POINT 0.5mm Dia" "Test-point - 0.5mm" 4305.75,934.04 r0 top
P12 "TEST POINT" Test-point 1497,3393 r0 top
P13 "TEST POINT" Test-point 1497,3487.64 r0 top
P14 "TEST POINT" Test-point 1497,3579.53 r0 top
P15 "TEST POINT" Test-point 1497,3670.26 r0 top
P19 "61300211121" HDR1X2 4115.12,-51.43 r0 top
P20 "61300411121" HDR1X4 3682.12,-51.43 r0 top
P27 "61300211121" HDR1X2 245.12,-49.43 r0 top
P28 "61300211121" HDR1X2 539.12,-49.43 r0 top
Q1 "WNM2016A-3/TR" sot-23 572.69,2432.84 r90 top
Q2 "WNM2016A-3/TR" sot-23 569.69,2920.6 r90 top
Q3 "WNM2016A-3/TR" sot-23 570.87,3406.03 r90 top
Q4 "WNM2016A-3/TR" sot-23 567.87,3895.03 r90 top
Q5 "IRF3205STRLPBF" D2Pak. 1036.48,1328.55 r90 top
Q6 "IRF3205STRLPBF" D2Pak. 1036.48,1864.57 r90 top
Q7 "IRLML6402TRPBF" SOT-23 5031.64,821.77 r180 top
Q8 "WNM2016A-3/TR" sot-23 566.87,4382.03 r90 top
Q9 "BC847B,215" SOT-23 5818.87,1483.56 r180 top
Q10 "BC847B,215" SOT-23 5088.57,1483.56 r180 top
Q11 "BC847B,215" SOT-23 5744.87,1621.8 r180 top
Q12 "BC847B,215" SOT-23 5017.24,1621.8 r180 top
Q13 "BC847B,215" SOT-23 4725.87,1621.8 r180 top
Q14 "BC847B,215" SOT-23 5450.61,1621.8 r180 top
Q15 "BC847B,215" SOT-23 5450.87,735.03 r180 top
Q16 "BC847B,215" SOT-23 4756.87,735.03 r180 top
Q17 "BC857C,215" SOT-23 4798.41,1483.56 r180 top
Q18 "MMBT5551" SOT-23 5127.87,702.36 r180 top
Q19 "MMBT5551" SOT-23 7362.87,3423.03 r270 top
Q20 "RU6085H" RU6085H 1364.62,735.77 r0 top
Q21 "IRLML6402TRPBF" SOT-23 5712.87,821.77 r180 top
Q22 "MMBT2222A-7-F" SOT-23 1451.22,3140.4 r180 top
Q23 "MMBT2222A-7-F" SOT-23 3201.6,3373.26 r0 top
Q24 "BC857C,215" SOT-23 5521.87,1483.56 r180 top
Q25 "DMN13H750S-7" SOT23-3 4166.1,156.57 r180 top
Q26 "DMN13H750S-7" SOT23-3 3739.69,156.57 r180 top
Q27 "DMN13H750S-7" SOT23-3 3881.19,156.57 r180 top
Q28 "DMN13H750S-7" SOT23-3 4022.69,156.57 r180 top
Q29 "BC847B,215" SOT-23 5450.47,1124.66 r180 top
Q30 "BC847B,215" SOT-23 4756.87,1128.25 r180 top
Q31 "MMBT5551" SOT-23 5811.87,702.36 r180 top
Q32 "AO3407" SOT-23 587.77,395.86 r90 top
Q33 "MMBT2222A-7-F" SOT-23 772.64,397.63 r180 top
Q38 "MMBT5551" SOT-23 7183.87,769.03 r0 top
Q39 "2N7002-7-F" SOT23-3 1938.83,570.29 r0 top
Q40 "MMBT2222A-7-F" SOT-23 1611.98,3140.4 r180 top
Q43 "MMBT2222A-7-F" SOT-23 3482.6,3373.26 r0 top
R1 "3.6K" RES-0603 2787.87,1380.03 r180 top
R2 "1.2k" RES-0603 2624.98,1315.4 r0 top
R3 "0.33R" RES-0603 2624.98,1198.93 r180 top value=0.33Ω
R4 "10K" RES-0603 670.87,3399.55 r90 top
R5 "4.7K" RES-0603 1808.5,1216.29 r180 top
R6 "10K" RES-0603 667.87,3889.55 r90 top
R7 "6.8K" RES-0603 1648.28,1241.51 r90 top value=6.8kR
R8 "4.7K" RES-0603 1807.5,1685.29 r180 top
R9 "10K" RES-0603 666.87,4378.01 r90 top
R10 "6.8K" RES-0603 1646.28,1715.51 r90 top value=6.8kR
R11 "2.21M" RES-0603 909.82,260.46 r270 top
R12 "10K" Res-0402 3994.91,2189 r270 top
R13 "2.7K" Res-0402 3955.54,2189 r270 top value=2.7kR
R14 "680R" RES-0603 4882.36,2435.03 r0 top
R15 "680R" RES-0603 4882.86,2386.27 r0 top
R16 "2.2K" Res-0402 4036,3558 r180 top
R17 "680R" RES-0603 4882.86,2337.5 r0 top
R18 "2.2K" RES-0603 5792.92,4115.3 r0 top
R19 "2.2K" RES-0603 6289.27,4115.3 r0 top
R20 "10K" RES-0603 7228.64,878.03 r90 top
R21 "10K" RES-0603 7269.98,515.4 r90 top
R22 "2.2K" RES-0603 7146.14,516.03 r270 top
R23 "3.3K" RES-0603 6828.44,2459.75 r180 top
R24 "47R" RES-0603 1368.87,1175.03 r270 top
R25 "47R" RES-0603 1368.87,1705 r270 top
R26 "1K" RES-0603 4960.17,723.62 r180 top
R27 "10K" RES-0603 5037.64,920.03 r180 top
R28 "4.7K" Res-0603 5191.41,830.31 r270 top
R29 "1K" Res-0603 5137.87,831.31 r270 top
R30 "20K" RES-0603 1012.14,260.46 r270 top
R31 "4.7K" Res-0402 4309.88,2189 r90 top
R32 "63.4K" RES-0603 1085.14,260.46 r270 top
R33 "4.7K" RES-0603 5875.87,831.31 r270 top
R34 "1K" RES-0603 578.87,293.03 r0 top
R35 "3.3K" RES-0603 6828.44,1779.92 r180 top
R36 "3.3K" RES-0603 7288.23,1859.03 r90 top
R37 "2.2K" RES-0603 7197.84,1891.03 r0 top
R38 "3.3K" Res-0603 7289.44,2541.49 r90 top
R39 "2.2K" RES-0603 7198.05,2572.49 r0 top
R40 "1K" RES-0603 5763.87,1381.03 r270 top
R41 "1K" RES-0603 5035.03,1381.03 r270 top
R42 "4.7K" RES-0603 5920.87,1554.03 r90 top
R43 "4.7K" RES-0603 5707.87,1504.03 r270 top
R44 "4.7K" RES-0603 5181.87,1554.03 r90 top
R45 "4.7K" RES-0603 4979.84,1504.03 r270 top
R46 "4.7K" RES-0603 5752.87,1721.03 r180 top
R47 "4.7K" RES-0603 5023.87,1721.03 r180 top
R48 "4.7K" RES-0603 4629.87,1564.03 r90 top
R49 "4.7K" RES-0603 5351.87,1564.32 r90 top
R50 "1K" RES-0603 5311.87,570.92 r270 top
R51 "1K" RES-0603 4621.23,569.92 r270 top
R52 "4.7K" RES-0603 4732.87,1717.03 r180 top
R53 "4.7K" Res-0603 7525.38,4542.53 r90 top
R54 "0R" RES-0603 7459.87,4247.03 r180 top
R55 "10K" RES-0603 6968.87,4060.03 r180 top
R56 "4.7K" RES-0603 5458.87,1717.03 r180 top
R57 "4.7K" Res-0402 5275.87,3732.03 r0 top
R58 "4.7K" Res-0402 5275.87,3785.51 r0 top
R59 "4.7K" Res-0402 5275.87,3835.51 r0 top
R60 "4.7K" Res-0402 5275.87,3885.51 r0 top
R61 "4.7K" Res-0402 4882.53,3768.03 r270 top
R62 "4.7K" RES-0603 7234.48,3460.44 r180 top
R63 "22R" Res-0402 4867.17,3947.53 r90 top
R64 "100K" RES-0805 1283.98,429.4 r0 top
R65 "1K" Res-1206 1577.98,415.4 r90 top
R66 "10K" RES-0603 7197.99,516.03 r270 top
R67 "1K" RES-0603 5642.87,723.62 r180 top
R68 "10K" RES-0603 5719.87,920.03 r180 top
R69 "10K" RES-0603 672.69,2426.36 r90 top
R70 "10K" RES-0603 670.69,2914.12 r90 top
R71 "1K" RES-0603 679.14,388.46 r270 top
R72 "10K" RES-0603 4203.51,278.03 r90 top
R73 "10K" RES-0603 3777.1,278.03 r90 top
R74 "10K" RES-0603 3918.6,278.03 r90 top
R75 "10K" RES-0603 4060.1,278.03 r90 top
R76 "3.3K" RES-0603 6828.44,1097.92 r180 top
R77 "3.3K" RES-0603 7288.23,1178.82 r90 top
R78 "2.2K" RES-0603 7197.84,1208.82 r0 top
R79 "3.3K" RES-0603 6829.23,2990.92 r180 top
R80 "2.2K" RES-0603 7263.23,2990.92 r0 top
R81 "470R" RES-0603 811.04,533.96 r270 top
R82 "10K" RES-0603 1087.14,533.96 r90 top
R83 "200K" RES-0603 1680.8,2257.89 r90 top
R84 "200K" RES-0603 1652.87,2393.03 r0 top
R85 "1K" RES-0603 1680.8,2176.21 r0 top
R86 "4.7K" RES-0603 4744.87,1381.03 r90 top
R87 "22R" Res-0402 4925.54,3947.53 r90 top
R88 "4.7K" RES-0603 5465.87,1381.03 r90 top
R89 "100K" RES-0603 5497.87,614.03 r90 top
R90 "100K" RES-0603 4810.87,614.03 r90 top
R91 "1M" RES-0603 4688.47,1381.03 r90 top
R92 "1M" RES-0603 5408.87,1381.03 r90 top
R93 "330R" RES-0603 5311.87,961.03 r270 top
R94 "330R" RES-0603 4621.79,965.03 r270 top
R95 "50K" "RES 0805" 4835.87,1621.8 r90 top
R96 "50K" "RES 0805" 5560.87,1621.8 r90 top
R97 "150K" RES-0603 4850.81,1381.03 r270 top
R98 "150K" RES-0603 5573.87,1381.03 r270 top
R99 "100K" RES-0603 5487.87,1008.03 r90 top
R100 "100K" RES-0603 4796.87,1008.03 r90 top
R101 "10K" RES-0603 4688.47,1504.03 r90 top
R102 "10K" RES-0603 5408.87,1504.03 r90 top
R103 "150R" RES-0603 6275.03,645.4 r270 top
R104 "10K" RES-0603 7400.07,4185.03 r0 top
R105 "100K" RES-0603 7235.87,4131.37 r0 top
R106 "4.7K" Res-0402 4910.03,3835.51 r0 top
R107 "1K" Res-0603 5821.87,831.31 r270 top
R108 "120R" Res-0603 4896.03,3885.51 r0 top
R110 "10K" Res-0603 6220.69,644.4 r270 top
R111 "2.2K" Res-0603 6166.74,644.4 r270 top
R112 "7.5K" Res-0603 6435.87,646.4 r270 top
R113 "3.3K" Res-0603 6542.87,646.4 r270 top
R114 "10K" Res-0603 6489.53,646.4 r270 top
R115 "2.2K" Res-0603 6489.53,759.03 r270 top
R116 "20K" Res-0603 6934.84,4586.41 r225 top
R117 "0R" Res-0603 909.82,533.96 r270 top
R118 "0R" Res-0603 1012.18,533.96 r270 top
R119 "10R" RES-0805 2067.75,780.67 r270 top
R120 "4mR" "RES 2512" 2858.75,734.67 r180 top
R121 "2.2R" Res-0402 2432.75,790.67 r270 top
R122 "5.23K" RES-0603 2186.75,519.67 r270 top
R123 "499K" Res-0402 2028.87,672.03 r90 top
R124 "30.1K" RES-0603 2113.75,519.67 r270 top
R125 "36K" Res-0402 2028.87,589.79 r90 top value=36kR
R126 "10K" Res-0603 1883.87,192.03 r0 top
R127 "499K" Res-0603 2340.75,536.67 r270 top
R128 "10K" Res-0603 1883.87,255.03 r0 top
R129 "86.6K" Res-0402 2283.66,536.67 r90 top value=86.6kR
R130 "100K" Res-0201 3976.23,970.16 r0 top
R131 "470R" Res-0603 4235.87,803.8 r90 top
R132 "470R" Res-0201 3646.87,440.03 r0 top
R133 "47K" Res-0402 3980.23,1010.16 r180 top
R134 "10K" Res-0402 3615.36,2856.36 r0 top
R135 "1K" Res-0201 2964.87,3454.33 r0 top
R137 "220R" Res-0603 1454.87,2881.6 r180 top
R138 "4.7K" Res-0402 1652.38,3257.4 r270 top
R139 "47K" Res-0402 1595.87,3236.03 r0 top
R140 "1K" Res-0201 2964.87,3414.96 r0 top
R141 "4.7K" Res-0402 1492.38,3257.4 r270 top
R142 "47K" Res-0402 1433.72,3235.9 r0 top
R143 "10R" Res-0402 2609,4559.04 r90 top
R144 "47K" Res-0402 1356.87,3916.53 r90 top
R145 "220R" Res-0603 1454.87,2951.76 r180 top
R146 "4.7K" Res-0402 3445.65,3267.03 r270 top
R147 "47K" Res-0402 3498.74,3285.53 r180 top
R148 "0R" RES-2512 2227.87,225.03 r0 top
R149 "0R" RES-2512 827.87,776.03 r180 top
R150 "22R" Res-0201 1324.86,4004.03 r0 top
R151 "22R" Res-0201 1324.86,4083.41 r0 top
R152 "22R" Res-0201 1324.86,3970.03 r0 top
R153 "22R" Res-0201 1324.86,4117.12 r0 top
R154 "4.7K" Res-0402 3164.2,3267.03 r90 top
R155 "47K" Res-0402 3217.6,3285.53 r180 top
R156 "10K" Res-0201 4248.31,4054.7 r270 top
R157 "10K" Res-0201 4117,3981 r270 top
R158 "10K" Res-0201 4018.54,4054.48 r270 top
R159 "10K" Res-0201 3936.92,4054.7 r270 top
R160 "10K" Res-0201 3816,4484 r270 top
SB2 "Solder Bridge" "Solder Bridge" 4932.67,815.31 r270 top
SB3 "Solder Bridge" "Solder Bridge" 7443.87,4626.46 r180 top
SB4 "Solder Bridge" "Solder Bridge" 7795.87,3993.03 r90 top
SB5 "Solder Bridge" "Solder Bridge" 6600.87,567.03 r270 top
SB6 "Solder Bridge" "Solder Bridge" 7401.07,4063.64 r0 top
SB7 "Solder Bridge" "Solder Bridge" 1426.98,433.4 r180 top
SB8 "Solder Bridge" "Solder Bridge" 5613.87,815.31 r270 top
SB9 "Solder Bridge" "Solder Bridge" 678.87,523.03 r270 top
SB16 "Solder Bridge" "Solder Bridge" 7884.87,3963.03 r180 top
SB17 "Solder Bridge" "Solder Bridge" 7401.07,4012.64 r180 top
SB18 "Solder Bridge" "Solder Bridge" 6967.87,4163.03 r180 top
SB19 "Solder Bridge" "Solder Bridge" 6234.98,3555.4 r180 top
SB20 "Solder Bridge" "Solder Bridge" 6234.98,3455.4 r180 top
SB35 "Solder Bridge" "Solder Bridge" 6328.65,646.4 r270 top
SB36 "Solder Bridge" "Solder Bridge" 6382.98,646.4 r270 top
SB37 "Solder Bridge" "Solder Bridge" 6166.74,761.03 r90 top
SB38 "Solder Bridge" "Solder Bridge" 6600.87,815.03 r90 top
SB39 "Solder Bridge" "Solder Bridge" 619.87,523.03 r90 top
SB40 "Solder Bridge" "Solder Bridge" 1624.87,774.03 r0 top
SB41 "Solder Bridge" "Solder Bridge" 6967.87,4111.03 r180 top
SB42 "Solder Bridge" "Solder Bridge" 7401.07,4135.25 r0 top
SB43 "Solder Bridge" "Solder Bridge" 7496.98,567.4 r270 top
SB44 "Solder Bridge" "Solder Bridge" 7439.98,567.4 r270 top
SW1 "Tactile Switch" TL3300CF160Q 5595.42,4393.55 r90 top
SW2 "Tactile Switch" TL3300CF160Q 6091.2,4393.55 r90 top
SW3 "" TL3300CF160Q 6586.98,4393.55 r90 top
SW4 "" SS-12D02-G040 4018.13,3675.03 r0 top
U1 "ACS723LLCTR-20AU-T" SOIC-8 2034.5,1240.29 r180 top
U2 "ACS723LLCTR-20AU-T" SOIC-8 2034.5,1710.29 r180 top
U3 "MC34063ADR" SOIC-8 2848.99,1229.3 r180 top
U4 "LMS8117AMP-3.3/NOPB" SOT-223 3971.28,1831.57 r0 top
U6 "NCP81071ADR2G" SOIC-8 1483.69,2252.21 r180 top
U7 "LTC4359CMS8#PBF" LTC4359CMS8#PBF 1371.85,547.5 r0 top
U8 "PS2801C-1-F3-A" PS2801C-1-F3-A 7048.23,1122.92 r180 top
U9 "PS2801C-1-F3-A" PS2801C-1-F3-A 7047.23,3015.92 r180 top
U10 "SN74LV1T34DBVR" SOT-23-5 1841.28,2189.85 r180 top
U11 "SN74LV1T34DBVR" SOT-23-5 1841.69,2406.21 r180 top
U12 "SN74LV1T34DBVR" SOT-23-5 1841.28,2541.06 r180 top
U13 "TPS3700DDCR" SOT-23-6 961,397.63 r0 top
U14 "PS2801C-1-F3-A" PS2801C-1-F3-A 7048.23,1803.92 r180 top
U15 "PS2801C-1-F3-A" PS2801C-1-F3-A 7046.44,2484.75 r180 top
U16 "MICRF220AYQS" 16-QSOP 7177.87,4000.03 r180 top
U17 "AS312" AS312 7076.91,4488.04 r225 top
U18 "AP4008QD" PDFN3x3 2553.95,765.62 r270 top
U19 "BQ24650RVAR" QFN-16-EP(3.6x3.6) 2246.64,682.83 r0 top
U20 "MIC29302WU-TR" "TO-263-5 (D2PAK)" 3675.57,817.03 r90 top
U21 "STM32F103ZGT6" LQFP-144(20x20) 4122.87,2696.03 r0 top locked
U22 "SMF05CT1G-ES" SOT-363 1230.87,4075.03 r270 top
U23 "TXB0102DCUT" TXB0102DCUT 3400.28,3890.21 r0 top
U24 "SP3485EIM/TR" SOP-8 5092.89,3810.51 r180 top
U25 "A7672E (FASE)" "A7672E (FASE)" 2416.26,3848.03 r270 top locked
U26 "TXB0102DCUT" TXB0102DCUT 3399.87,3756.03 r0 top
X1 "8MHz" XC32M4-8.000-F18LJDT 3502.16,2607.31 r270 top
X2 "13.52313MHz" HC-49S-2P 7179.87,3767.03 r180 top
X3 "32.768kHz" X321532768KGD2SI 3524,2892.1 r270 top

## Footprints (in the part's own frame and the unit in brackets; to place one, negate y for a bottom-side part, rotate by r counter-clockwise, add the part's x,y. Pads: shape width x height; smd on the part's side, far side on the other; paste and mask are expansions set on the pad)
16-QSOP [mm]
  rect 1.45x0.35 smd: 1(-2.475,2.222) 2(-2.475,1.587) 3(-2.475,0.952) 4(-2.475,0.317) 5(-2.475,-0.318) 6(-2.475,-0.953) 7(-2.475,-1.588) 8(-2.475,-2.223) 9(2.475,-2.222) 10(2.475,-1.587) 11(2.475,-0.952) 12(2.475,-0.317) 13(2.475,0.318) 14(2.475,0.953) 15(2.475,1.588) 16(2.475,2.223)
  silkscreen extent -3.54,-2.51 1.35,2.51, body extent -3,-2.45 3,2.45, height 1.76
10118194-0001LF_ [mm]
  rect 0.42x1.35 smd: 1(-1.3,0) 2(-0.65,0) 3(0,0) 4(0.65,0) 5(1.3,0)
  oval 1.25x1 hole 0.55 slot 0.85 at 0 deg: MH1(-2.5,0) MH2(2.5,0)
  oval 0.8x1.55 hole 0.5 slot 1.15 at 90 deg: MH3(-3.5,-2.7) MH4(3.5,-2.7)
  rect 1.5x1.55 smd: MP1(-1,-2.7) MP2(1,-2.7)
  Top Layer region: 193 vertices and 0 holes, not listed, extent -4,-3.475 -2.3,-1.92
  Top Layer region: 193 vertices and 0 holes, not listed, extent 2.3,-3.48 4,-1.925
  silkscreen extent -3.73,-5 3.72,0.71, body extent -4.02,-5.34 4.03,0.19, height 2.69
20021121-00010C4LF_ [mm]
  rect 0.76x2.4 smd: 1(-2.54,-1.95) 2(-2.54,1.95) 3(-1.27,-1.95) 4(-1.27,1.95) 5(0,-1.95) 6(0,1.95) 7(1.27,-1.95) 8(1.27,1.95) 9(2.54,-1.95) 10(2.54,1.95)
  silkscreen extent -3.43,-2.08 3.23,1.22, body extent -3.17,-2.78 3.18,2.72, height 4.5
A2008WR-S-8P [mm]
  rect 1x3.4 smd: 1(-7.5,3.75) 2(-5.5,3.75) 3(-3.5,3.75) 4(-1.5,3.75) 5(0.5,3.75) 6(2.5,3.75) 7(4.5,3.75) 8(6.5,3.75)
  rect 1.5x3.6 smd: MP1(-9.8,-3.75) MP2(8.8,-3.75)
  silkscreen extent -10.54,-5.82 9.54,3.84, body extent -10.51,-5.77 9.49,4.23, height 5.2
"A7672E (FASE)" [mm]
  rect 2x0.6 smd: 1(-12,8) 2(-12,7) 3(-12,6) 4(-12,5) 5(-12,4) 6(-12,3) 7(-12,2) 8(-12,1) 9(-12,0) 10(-12,-1) 11(-12,-2) 12(-12,-3) 13(-12,-4) 14(-12,-5) 15(-12,-6) 16(-12,-7) 17(-12,-8) 35(12,-8) 36(12,-7) 37(12,-6) 38(12,-5) 39(12,-4) 40(12,-3) 41(12,-2) 42(12,-1) 43(12,0) 44(12,1) 45(12,2) 46(12,3) 47(12,4) 48(12,5) 49(12,6) 50(12,7) 51(12,8)
  rect 0.6x2 smd: 18(-8,-12) 19(-7,-12) 20(-6,-12) 21(-5,-12) 22(-4,-12) 23(-3,-12) 24(-2,-12) 25(-1,-12) 26(0,-12) 27(1,-12) 28(2,-12) 29(3,-12) 30(4,-12) 31(5,-12) 32(6,-12) 33(7,-12) 34(8,-12) 52(8,12) 53(7,12) 54(6,12) 55(5,12) 56(4,12) 57(3,12) 58(2,12) 59(1,12) 60(0,12) 61(-1,12) 62(-2,12) 63(-3,12) 64(-4,12) 65(-5,12) 66(-6,12) 67(-7,12) 68(-8,12) 89(-11,-12) 90(-10,-12) 91(-9,-12) 92(9,-12) 93(10,-12) 94(11,-12) 95(11,12) 96(10,12) 97(9,12) 98(-9,12) 99(-10,12) 100(-11,12)
  rect 2.1x2.1 smd: 69(-7.6,7.6) 70(-7.6,3.8) 71(-7.6,0) 72(-7.6,-3.8) 73(-7.6,-7.6) 74(-3.8,-7.6) 75(0,-7.6) 76(3.8,-7.6) 77(7.6,-7.6) 78(7.6,-3.8) 79(7.6,0) 80(7.6,3.8) 81(7.6,7.6) 82(3.8,7.6) 83(0,7.6) 84(-3.8,7.6) 85(-3.8,0) 86(0,-3.8) 87(3.8,0) 88(0,3.8)
  rect 1.1x0.9 smd: 101(-9.8,3.5) 102(-9.8,2.1) 103(-9.8,0.7) 104(-9.8,-0.7) 105(-9.8,-2.1) 106(-9.8,-3.5) 113(9.8,-3.5) 114(9.8,-2.1) 115(9.8,-0.7) 116(9.8,0.7) 117(9.8,2.1) 118(9.8,3.5)
  rect 0.9x1.1 smd: 107(-3.5,-9.8) 108(-2.1,-9.8) 109(-0.7,-9.8) 110(0.7,-9.8) 111(2.1,-9.8) 112(3.5,-9.8) 119(3.5,9.8) 120(2.1,9.8) 121(0.7,9.8) 122(-0.7,9.8) 123(-2.1,9.8) 124(-3.5,9.8)
  Keep-Out Layer region: -10.7,6.795 -9,6.795 -9,9.195 -10.7,9.195
  Keep-Out Layer region: 1.473,-4.133 3.523,-4.133 3.523,-2.083 1.473,-2.083
  silkscreen extent -13.31,-12.06 12.04,12.07, body extent -12,-12 12,12, height 2.5
ALS-PT19-315C/L177/TR [mm]
  rect 0.82x0.82 smd: 1(-0.75,0) 2(0.75,0)
  silkscreen extent -1.7,-0.53 1.27,0.53, body extent -0.85,-0.4 0.85,0.4, height 0.6
ANT3216LL00R2400A [mm]
  rect 0.8x1.8 smd: 1(0,0) 2(3.1,0)
  Top Layer region: -0.178,0.897 -2.2,0.897 -2.2,-0.903 -0.178,-0.903
  Top Layer region: 3.277,-0.9 5.8,-0.9 5.8,0.9 3.277,0.9
  Keep-Out Layer region: 6.119,-1.067 7.769,-1.067 7.769,1.041 6.119,1.041
  Keep-Out Layer region: -2.137,1.27 7.769,1.27 7.769,4.953 -2.137,4.953
  Keep-Out Layer region: -2.137,-4.953 7.769,-4.953 7.769,-1.27 -2.137,-1.27
  silkscreen extent -2.2,-5 7.8,5, body extent -0.08,-0.8 3.12,0.8, height 1
AS312 [mm]
  round 1.8 hole 0.9: 1(-2.54,1.27) 2(0,-1.27) 3(2.54,1.27)
  silkscreen extent -4.55,-3.28 4.55,5.82, body extent -4.58,-3.25 4.52,5.85, height 4.25
Cap0402 [mil]
  rect 18x25 smd mask+2.36: 1(-18.5,0) 2(18.5,0)
  silkscreen extent -31,-16 31,16, body extent -20,-10 20,10, height 19
Cap0603 [mil]
  rect 30x35 smd mask+2.36: 1(-30,0) 2(30,0)
  silkscreen extent -49,-21 49,21, body extent -32,-16 31,16, height 34
CAP-0201 [mm]
  rect 0.3x0.3 smd mask+0.055: 1(-0.3,0) 2(0.3,0)
  silkscreen extent -0.53,-0.23 0.53,0.23, body extent -0.3,-0.15 0.3,0.15, height 0.28
Cap-0402 [mil]
  rect 18x25 smd mask+2.36: 1(-18.5,0) 2(18.5,0)
  silkscreen extent -31,-16 31,16, body extent -20,-10 20,10, height 19
Cap-0603 [mil]
  rect 30x35 smd mask+2.36: 1(-30,0) 2(30,0)
  silkscreen extent -49,-21 49,21, body extent -32,-16 31,16, height 34
Cap-0805 [mil] "SMD 0805"
  rect 40x60 smd mask+2.76: 1(-40,0) 2(40,0)
  silkscreen extent -64,-34 64,34, body extent -39,-25 39,25, height 30
Cap-1206 [mil] "SMD 1206"
  rect 60x70 smd: 1(-50,0) 2(50,0)
  silkscreen extent -84,-39 84,39, body extent -63,-31 63,32, height 39
Case-B [mm]
  rect 1.7x3 smd paste+0: 1(-1.7,0) 2(1.7,0)
  silkscreen extent -3.35,-1.63 2.03,1.63, body extent -1.85,-1.5 1.85,1.5, height 2.16
Case-E [mm]
  rect 2.79x2.57 smd: 1(0,0) 2(6.44,0)
  silkscreen extent -1.56,-2.31 7.03,2.31, body extent -0.27,-2.21 6.92,2.21, height 2.88
D2Pak. [mm]
  rect 2.08x3.81 smd: 1(-2.54,-5.335) 2(2.54,-5.335)
  rect 11.43x8.89 smd: 3(0,5.335)
  silkscreen extent -5.21,-5.46 5.11,0.51, body extent -5.08,-6.6 5.02,8.79, height 4.5
DFN1006-2L_ [mm]
  rect 0.55x0.66 smd: 1(-0.425,0) 2(0.425,0)
  silkscreen extent -1.14,-0.51 0.81,0.51, body extent -0.5,-0.3 0.5,0.3, height 0.47
DM3BT-DSF-PEJS [mm]
  rect 0.7x1.4 smd: 1(-2.85,7.45) 2(-1.75,7.45) 3(-0.65,7.45) 4(0.45,7.45) 5(1.55,7.45) 6(2.65,7.45) 7(3.75,7.45) 8(4.85,7.45)
  rect 1x1.4 smd: S1(-4.75,7.45)
  rect 1.2x1.2 smd: S2(6.65,3.25)
  rect 1.2x3.2 smd: S3(6.65,-6.55)
  rect 1.5x1.9 smd paste-2 mask+0: S4(-6.65,-7.55)
  rect 1.2x0.8 smd: SW-A(6.65,-2.95)
  rect 0.7x1.2 smd: SW-B(5.8,7.55)
  Top Layer region: -5.9,-7.85 -5.75,-8 -5.4,-8 -5.4,-8.5 -7.4,-8.5 -7.4,-6.6 -5.9,-6.6
  Keep-Out Layer region: 7.15,-0.95 6.4,-0.95 6.4,2.65 7.15,2.65
  Keep-Out Layer region: 7.15,3.85 6.4,3.85 6.4,7.1 7.15,7.1
  silkscreen extent -7,-8.58 6.85,8.46, body extent -6.96,-9.93 6.89,7.62, height 1.8
DSN0603-2 [mm]
  rect 0.2x0.24 smd mask+0.055: 1(-0.2,0) 2(0.2,0)
  silkscreen extent -0.38,-0.2 0.38,0.2, body extent -0.3,-0.15 0.3,0.15, height 0.32
Fuse-0603 [mm]
  rect 1x1 smd: 1(-0.85,0) 2(0.85,0)
  silkscreen extent -0.25,-0.48 0.25,0.48, body extent -0.77,-0.42 0.78,0.43, height 0.45
Fuse-0805 [mm]
  rect 1x1.7 smd: 1(-1.1,0) 2(1.1,0)
  silkscreen extent -0.41,-0.81 0.41,0.81, body extent -1.1,-0.75 1.1,0.75, height 1.24
HC-49S-2P [mm]
  round 1.6 hole 0.9: 1(-2.44,0) 2(2.44,0)
  silkscreen extent -5.66,-2.41 5.66,2.41, body extent -5.7,-2.29 5.65,2.36, height 3.7
HDR1X2 [mm] "CONN HEADER VERT 2POS 2.54MM"
  rect 1.8x1.8 hole 0.9: 1(0,0)
  round 1.8 hole 0.9: 2(2.54,0)
  silkscreen extent -1.27,-1.27 3.81,1.27, body extent -1.27,-1.27 3.81,1.27, height 8.44
HDR1X3 [mm] "Connector; Header; 3 Position"
  rect 1.8x1.8 hole 0.9: 1(0,0)
  round 1.8 hole 0.9: 2(2.54,0) 3(5.08,0)
  silkscreen extent -1.27,-1.27 6.35,1.27, body extent -1.27,-1.24 6.35,1.25, height 8.54
HDR1X4 [mm] "Connector; Header; 4 Position"
  rect 1.8x1.8 hole 0.95: 1(0,0)
  round 1.8 hole 0.95: 2(2.54,0) 3(5.08,0) 4(7.62,0)
  silkscreen extent -1.27,-1.27 8.89,1.27, body extent -1.27,-1.27 8.89,1.27, height 9.5
"HDR1X4 Female" [mm]
  rect 1.6x1.6 hole 0.95: 1(-3.81,0)
  round 1.6 hole 0.95: 2(-1.27,0) 3(1.27,0) 4(3.81,0)
  silkscreen extent -5.49,-1.27 5.36,1.27, body extent -5.38,-1.3 5.28,1.24, height 8.5
HDR1X4_ [mm] "Connector; Header; 4 Position"
  rect 1.6x1.6 hole 0.95: 1(0,0)
  round 1.6 hole 0.95: 2(2.54,0) 3(5.08,0) 4(7.62,0)
  silkscreen extent -1.27,-1.27 8.89,1.27, body extent -1.27,-1.27 8.89,1.27, height 9.5
HDR1X6 [mm] "Connector; Header; 6 Position"
  rect 1.8x1.8 hole 0.9: 1(0,0)
  round 1.8 hole 0.9: 2(2.54,0) 3(5.08,0) 4(7.62,0) 5(10.16,0) 6(12.7,0)
  silkscreen extent -1.27,-1.27 13.97,1.27, body extent -1.27,-1.24 13.97,1.25, height 8.54
HDR1X7 [mm] "Connector; Header; 7 Position"
  rect 1.6x1.6 hole 0.9: 1(0,0)
  round 1.6 hole 0.9: 2(2.54,0) 3(5.08,0) 4(7.62,0) 5(10.16,0) 6(12.7,0) 7(15.24,0)
  silkscreen extent -1.27,-1.27 16.51,1.27, body extent -1.27,-1.24 16.51,1.25, height 8.74
HJ-SMA508 [mm]
  round 2.5 hole 1.4: 1(0,0)
  round 2.5 hole 1.5: 2(-2.54,2.54) 3(-2.54,-2.54) 4(2.54,-2.54) 5(2.54,2.54)
  silkscreen extent -3.05,-3.05 3.05,3.05, body extent -3,-2.95 3,11.05, height 9.6
"IND 0402" [mm]
  rect 0.4x0.6 smd: 1(-0.35,0) 2(0.35,0)
  silkscreen extent -0.71,-0.46 0.71,0.46, body extent -0.5,-0.25 0.5,0.25, height 0.25
"IND 0603" [mm]
  rect 0.9x0.97 smd: 1(-0.785,0) 2(0.785,0)
  silkscreen extent -1.4,-0.64 1.4,0.64, body extent -0.8,-0.4 0.8,0.4, height 0.78
"IND-0603 (1608 Metric)" [mm] "0.063\" L x 0.032\" W (1.60mm x 0.80mm)"
  rect 0.6x0.8 smd: 1(-0.7,0) 2(0.7,0)
  silkscreen extent -0.2,-0.46 0.23,0.46, body extent -0.8,-0.4 0.8,0.4, height 0.78
Ind-0805 [mm] "Inductor 0805"
  rect 1.2x1.32 smd: 1(-1,0) 2(1,0)
  silkscreen extent -0.25,-0.69 0.25,0.69, body extent -1,-0.62 1,0.63, height 0.47
"LED 0402" [mm]
  rect 0.62x0.72 smd: 1(-0.475,0) 2(0.475,0)
  silkscreen extent -0.91,-0.56 1.6,0.56, body extent -0.5,-0.25 0.51,0.25, height 0.45
LED-0402 [mm]
  rect 0.62x0.72 smd: 1(-0.475,0) 2(0.475,0)
  silkscreen extent -0.89,-0.51 1.55,0.51, body extent -0.5,-0.25 0.51,0.25, height 0.45
LED-0603 [mm]
  rect 0.5x1 smd: 1(-0.75,0) 2(0.75,0)
  silkscreen extent -1.12,-0.66 1.75,0.66, body extent -0.82,-0.37 0.82,0.36, height 0.68
LQFP-144(20x20) [mm]
  rect 1.56x0.28 smd: 1(-10.68,8.75) 2(-10.68,8.25) 3(-10.68,7.75) 4(-10.68,7.25) 5(-10.68,6.75) 6(-10.68,6.25) 7(-10.68,5.75) 8(-10.68,5.25) 9(-10.68,4.75) 10(-10.68,4.25) 11(-10.68,3.75) 12(-10.68,3.25) 13(-10.68,2.75) 14(-10.68,2.25) 15(-10.68,1.75) 16(-10.68,1.25) 17(-10.68,0.75) 18(-10.68,0.25) 19(-10.68,-0.25) 20(-10.68,-0.75) 21(-10.68,-1.25) 22(-10.68,-1.75) 23(-10.68,-2.25) 24(-10.68,-2.75) 25(-10.68,-3.25) 26(-10.68,-3.75) 27(-10.68,-4.25) 28(-10.68,-4.75) 29(-10.68,-5.25) 30(-10.68,-5.75) 31(-10.68,-6.25) 32(-10.68,-6.75) 33(-10.68,-7.25) 34(-10.68,-7.75) 35(-10.68,-8.25) 36(-10.68,-8.75) 73(10.68,-8.75) 74(10.68,-8.25) 75(10.68,-7.75) 76(10.68,-7.25) 77(10.68,-6.75) 78(10.68,-6.25) 79(10.68,-5.75) 80(10.68,-5.25) 81(10.68,-4.75) 82(10.68,-4.25) 83(10.68,-3.75) 84(10.68,-3.25) 85(10.68,-2.75) 86(10.68,-2.25) 87(10.68,-1.75) 88(10.68,-1.25) 89(10.68,-0.75) 90(10.68,-0.25) 91(10.68,0.25) 92(10.68,0.75) 93(10.68,1.25) 94(10.68,1.75) 95(10.68,2.25) 96(10.68,2.75) 97(10.68,3.25) 98(10.68,3.75) 99(10.68,4.25) 100(10.68,4.75) 101(10.68,5.25) 102(10.68,5.75) 103(10.68,6.25) 104(10.68,6.75) 105(10.68,7.25) 106(10.68,7.75) 107(10.68,8.25) 108(10.68,8.75)
  rect 0.28x1.56 smd: 37(-8.75,-10.68) 38(-8.25,-10.68) 39(-7.75,-10.68) 40(-7.25,-10.68) 41(-6.75,-10.68) 42(-6.25,-10.68) 43(-5.75,-10.68) 44(-5.25,-10.68) 45(-4.75,-10.68) 46(-4.25,-10.68) 47(-3.75,-10.68) 48(-3.25,-10.68) 49(-2.75,-10.68) 50(-2.25,-10.68) 51(-1.75,-10.68) 52(-1.25,-10.68) 53(-0.75,-10.68) 54(-0.25,-10.68) 55(0.25,-10.68) 56(0.75,-10.68) 57(1.25,-10.68) 58(1.75,-10.68) 59(2.25,-10.68) 60(2.75,-10.68) 61(3.25,-10.68) 62(3.75,-10.68) 63(4.25,-10.68) 64(4.75,-10.68) 65(5.25,-10.68) 66(5.75,-10.68) 67(6.25,-10.68) 68(6.75,-10.68) 69(7.25,-10.68) 70(7.75,-10.68) 71(8.25,-10.68) 72(8.75,-10.68) 109(8.75,10.68) 110(8.25,10.68) 111(7.75,10.68) 112(7.25,10.68) 113(6.75,10.68) 114(6.25,10.68) 115(5.75,10.68) 116(5.25,10.68) 117(4.75,10.68) 118(4.25,10.68) 119(3.75,10.68) 120(3.25,10.68) 121(2.75,10.68) 122(2.25,10.68) 123(1.75,10.68) 124(1.25,10.68) 125(0.75,10.68) 126(0.25,10.68) 127(-0.25,10.68) 128(-0.75,10.68) 129(-1.25,10.68) 130(-1.75,10.68) 131(-2.25,10.68) 132(-2.75,10.68) 133(-3.25,10.68) 134(-3.75,10.68) 135(-4.25,10.68) 136(-4.75,10.68) 137(-5.25,10.68) 138(-5.75,10.68) 139(-6.25,10.68) 140(-6.75,10.68) 141(-7.25,10.68) 142(-7.75,10.68) 143(-8.25,10.68) 144(-8.75,10.68)
  silkscreen extent -11.81,-10.03 10.03,10.03, body extent -11,-11 11,11, height 1.61
LTC4359CMS8#PBF [mm]
  rect 0.889x0.42 smd: 1(-2.105,0.975) 2(-2.105,0.325) 3(-2.105,-0.325) 4(-2.105,-0.975) 5(2.105,-0.975) 6(2.105,-0.325) 7(2.105,0.325) 8(2.105,0.975)
  silkscreen extent -2.51,-1.57 1.42,1.57, body extent -2.46,-1.53 2.46,1.52, height 1.01
PDFN3x3 [mm]
  rect 0.6x0.4 smd: 1(-1.5,0.975) 2(-1.5,0.325) 3(-1.5,-0.325) 4(-1.5,-0.975) 5(1.5,-0.325) 5(1.5,-0.975) 6(1.5,0.975) 6(1.5,0.325)
  rect 2.35x1.27 smd: 5(0.356,-0.762)
  rect 2.35x1.29 smd: 6(0.356,0.762)
  silkscreen extent -1.99,-1.68 1.55,1.68, body extent -1.68,-1.64 1.68,1.64, height 0.77
"Pogo 4 Pin" [mm]
  round 1.6 smd: 1(-3.75,0) 2(-1.25,0) 3(1.25,0) 4(3.75,0)
  silkscreen extent -5.11,-1.09 4.83,1.09
"PowerDI™ 5" [mm]
  rect 1.39x1.4 smd: 1(-0.92,-1.991) 2(0.92,-1.991)
  rect 3.36x4.86 smd: 3(0,1.991)
  silkscreen extent -2.16,-2.24 2.03,3.51, body extent -1.98,-2.39 1.98,4.12, height 1.15
PS2801C-1-F3-A [mm]
  rect 1.3x0.9 smd: 1(-3.15,0.635) 2(-3.15,-0.635) 3(3.15,-0.635) 4(3.15,0.635)
  silkscreen extent -3.77,-1.45 2,1.45, body extent -3.5,-1.4 3.5,1.4, height 2.1
QFN-16-EP(3.6x3.6) [mm]
  rect 0.82x0.28 smd: 1(-1.75,0.75) 2(-1.75,0.25) 3(-1.75,-0.25) 4(-1.75,-0.75) 9(1.75,-0.75) 10(1.75,-0.25) 11(1.75,0.25) 12(1.75,0.75)
  rect 0.28x0.82 smd: 5(-0.75,-1.75) 6(-0.25,-1.75) 7(0.25,-1.75) 8(0.75,-1.75) 13(0.75,1.75) 14(0.25,1.75) 15(-0.25,1.75) 16(-0.75,1.75)
  round 0.5 hole 0.3: 17(-0.5,-0.5) 17(-0.5,0.5) 17(0.5,-0.5) 17(0.5,0.5)
  rect 2.14x2.14 smd: 17(0,0)
  silkscreen extent -2.4,-1.8 1.78,1.8, body extent -1.75,-1.75 1.75,1.75, height 1
"RES 0805" [mil] "SMD 0805"
  rect 40x50 smd: 1(-40,0) 2(40,0)
  silkscreen extent -64,-29 64,29, body extent -39,-25 39,24, height 24
"RES 2512" [mm] "0.033O ±1% 2W ±1800ppm/°C 2512 Low Resistors & Current Sense Resistors - Surface Mount RoHS"
  rect 1.6x3.4 smd: 1(-3.25,0) 2(3.25,0)
  silkscreen extent -4.24,-1.85 4.24,1.85, body extent -3.17,-1.63 3.18,1.63, height 0.58
Res-0201 [mm]
  rect 0.27x0.37 smd mask+0.055: 1(-0.275,0) 2(0.275,0)
  silkscreen extent -0.48,-0.25 0.48,0.25, body extent -0.3,-0.15 0.3,0.15, height 0.29
Res-0402 [mil]
  rect 18x25 smd mask+2.17: 1(-18.5,0) 2(18.5,0)
  silkscreen extent -32,-17 32,16, body extent -23,-11 23,11, height 16
RES-0603 [mil]
  rect 30x35 smd: 1(-30,0) 2(30,0)
  silkscreen extent -49,-21 49,21, body extent -31,-17 31,17, height 18
Res-0603 [mil]
  rect 30x35 smd: 1(-30,0) 2(30,0)
  silkscreen extent -48,-21 48,21, body extent -31,-17 31,17, height 18
RES-0805 [mil] "SMD 0805"
  rect 40x50 smd: 1(-40,0) 2(40,0)
  silkscreen extent -64,-29 64,29, body extent -39,-25 39,24, height 24
Res-1206 [mil]
  rect 60x70 smd: 1(-50,0) 2(50,0)
  silkscreen extent -84,-39 84,39, body extent -63,-31 63,32, height 39
RES-2512 [mm]
  rect 1.6x3.4 smd: 1(-3.25,0) 2(3.25,0)
  silkscreen extent -4.24,-1.85 4.24,1.85, body extent -3.17,-1.63 3.18,1.63, height 0.58
RU6085H [mm]
  rect 1.4x0.57 smd: 1(-2.75,1.905) 2(-2.75,0.635) 3(-2.75,-0.635) 4(-2.75,-1.905) 5(2.75,-1.905) 6(2.75,-0.635) 7(2.75,0.635) 8(2.75,1.905)
  silkscreen extent -2.88,-2.57 1.85,2.72, body extent -3.1,-2.5 3.1,2.5, height 1.5
RVT1E100M0405. [mm] "10uF 25V 5.4mm SMD"
  rect 2.6x1.6 smd: 1(-1.8,0) 2(1.8,0)
  silkscreen extent -3.1,-2.21 2.16,2.21, body extent -2.65,-2.15 2.65,2.15, height 3.95
SLF12575T-221M1R3-PF [mm]
  rect 2.6x3.2 smd: 1(-5.55,0) 2(5.55,0)
  silkscreen extent -7.48,-6.32 6.35,6.32, body extent -6.27,-6.33 6.33,6.27, height 7.5
SMA#1 [mm]
  rect 2x2 smd: 1(-2,0) 2(2,0)
  silkscreen extent -4.24,-1.55 2.08,1.55, body extent -2.6,-1.3 2.6,1.3, height 2.4
SMA#2 [mm]
  rect 2.5x1.7 smd: 1(-2,0) 2(2,0)
  silkscreen extent -4.45,-1.42 2.06,1.42, body extent -2.6,-1.3 2.6,1.3, height 2.4
SMAJ5.0CA [mm]
  rect 2x2 smd: 1(-2,0) 2(2,0)
  silkscreen extent -3.1,-1.52 2.06,1.52, body extent -2.6,-1.3 2.6,1.3, height 2.4
SMB [mm]
  rect 2.5x2.3 smd: 1(-2.15,0) 2(2.15,0)
  silkscreen extent -4.42,-1.91 2.27,1.9, body extent -2.7,-1.8 2.7,1.8, height 2.3
SMB_ [mm]
  rect 2.8x2.4 smd: 1(-2.3,0) 2(2.3,0)
  silkscreen extent -2.21,-1.9 4.83,1.91, body extent -2.7,-1.8 2.7,1.8, height 2.3
SOD-123 [mm]
  rect 0.95x0.9 smd: 1(-1.575,0) 2(1.575,0)
  silkscreen extent -1.37,-0.8 2.82,0.8, body extent -1.82,-0.77 1.83,0.78, height 1.5
SOD-523 [mm] "SOD-523 Schottky Barrier Diodes (SBD) ROHS"
  rect 0.6x0.7 smd: 1(-0.6,0) 2(0.6,0)
  silkscreen extent -0.61,-0.53 1.43,0.53, body extent -0.8,-0.4 0.8,0.4, height 0.7
SOD-882 [mm]
  rect 0.5x0.8 smd mask+0.055: 1(-0.35,0) 2(0.35,0)
  silkscreen extent -0.69,-0.53 1.15,0.53, body extent -0.49,-0.29 0.49,0.29, height 0.48
SOIC-8 [mm]
  rect 1.6x0.65 smd: 1(-2.667,1.905) 2(-2.667,0.635) 3(-2.667,-0.635) 4(-2.667,-1.905) 5(2.733,-1.905) 6(2.733,-0.635) 7(2.733,0.635) 8(2.733,1.905)
  silkscreen extent -3.34,-2.54 1.99,2.68, body extent -3,-2.46 3,2.46, height 1.61
"Solder Bridge" [mil] "Solder Bridge ON"
  rect 30x35 smd: 1(-30,0) 2(30,0)
  silkscreen extent -50,-22 50,22
SOP-8 [mm]
  rect 1.3x0.7 smd: 1(-2.75,1.905) 2(-2.75,0.635) 3(-2.75,-0.635) 4(-2.75,-1.905) 5(2.75,-1.905) 6(2.75,-0.635) 7(2.75,0.635) 8(2.75,1.905)
  silkscreen extent -3.69,-2.57 2.03,2.57, body extent -3.1,-2.5 3.1,2.5, height 1.76
SOT23-3 [mm] "SOT23, 3-Leads, Body 2.9x1.3mm, Pitch 0.95mm, Lead Span 2.3mm - Reverse Pinning, IPC High Density"
  rect 0.8x0.8 smd: 1(-0.95,-1.075) 2(0.95,-1.075) 3(0,1.075)
  silkscreen extent -1.73,-1.19 1.55,0.74, body extent -1.5,-1.25 1.5,1.25, height 1.05
Sot-23 [mm] "TRANS NPN 40V 0.6A SOT23"
  rect 0.82x0.92 smd: 1(-0.95,-1) 2(0.95,-1) 3(0,1)
  silkscreen extent -1.68,-1.3 1.55,0.81, body extent -1.5,-1.25 1.5,1.25, height 1.05
sot-23 [mm] "TRANS NPN 40V 0.6A SOT23"
  rect 0.82x0.92 smd: 1(-0.95,-1) 2(0.95,-1) 3(0,1)
  silkscreen extent -1.68,-1.3 1.55,0.81, body extent -1.5,-1.25 1.5,1.25, height 1.05
SOT-23 [mm] "TRANS NPN 40V 0.6A SOT23"
  rect 0.82x0.92 smd: 1(-0.95,-1) 2(0.95,-1) 3(0,1)
  silkscreen extent -1.82,-1.23 1.55,0.74, body extent -1.5,-1.25 1.5,1.25, height 1.1
SOT-23-5 [mm]
  rect 1.1x0.6 smd: 1(-1.3,0.95) 2(-1.3,0) 3(-1.3,-0.95) 4(1.3,-0.95) 5(1.3,0.95)
  silkscreen extent -1.74,-1.5 0.88,1.65, body extent -1.4,-1.45 1.4,1.45, height 1.45
SOT-23-6 [mm] "IC BAT CHG LI-ION 1 CELL SOT23-6"
  rect 1.12x0.62 smd: 1(-1.3,0.95) 2(-1.3,0) 3(-1.3,-0.95) 4(1.3,-0.95) 5(1.3,0) 6(1.3,0.95)
  silkscreen extent -1.57,-1.5 0.86,1.7, body extent -1.4,-1.45 1.4,1.45, height 1.44
SOT-223 [mm]
  rect 0.95x2.15 smd: 1(-2.3,-2.9) 2(0,-2.9) 3(2.3,-2.9)
  rect 3.25x2.15 smd: 4(0,2.9)
  silkscreen extent -3.6,-3.07 3.3,1.75, body extent -3.28,-3.51 3.22,3.45, height 1.65
SOT-363 [mm]
  rect 0.8x0.4 smd: 1(-0.97,0.65) 2(-0.97,0) 3(-0.97,-0.65) 4(0.97,-0.65) 5(0.97,0) 6(0.97,0.65)
  silkscreen extent -1.65,-1.09 0.51,1.09, body extent -1.15,-1.05 1.15,1.05, height 1
SS510B [mm]
  rect 2.4x2.8 smd: 1(-2.3,0) 2(2.3,0)
  silkscreen extent -4.57,-1.91 2.03,1.9, body extent -2.7,-1.8 2.7,1.8, height 2.3
SS-12D02-G040 [mm]
  rect 1.7x1.7 hole 1: 1(-2,0)
  round 1.7 hole 1: 2(0,0) 3(2,0)
  rect 1.5x2.2 hole 0.7 square: MH1(-4.1,0) MH2(4.1,0)
  silkscreen extent -4.32,-2.31 4.32,2.31, body extent -4.32,-2.25 4.28,2.25, height 9.47